# Altium PCB MezzanineDCDC_R1.PcbDoc (part 1 of 3)
Units mm, origin at the board's own origin, x right, y up, seen from the top; angles counter-clockwise.
Board outline 70 x 70 mm, 4 copper layers (Top Layer, GND 1, Signal, Bottom Layer), stack 1.554 mm thick; 95 components, 53 nets, 436 pads, 382 vias.
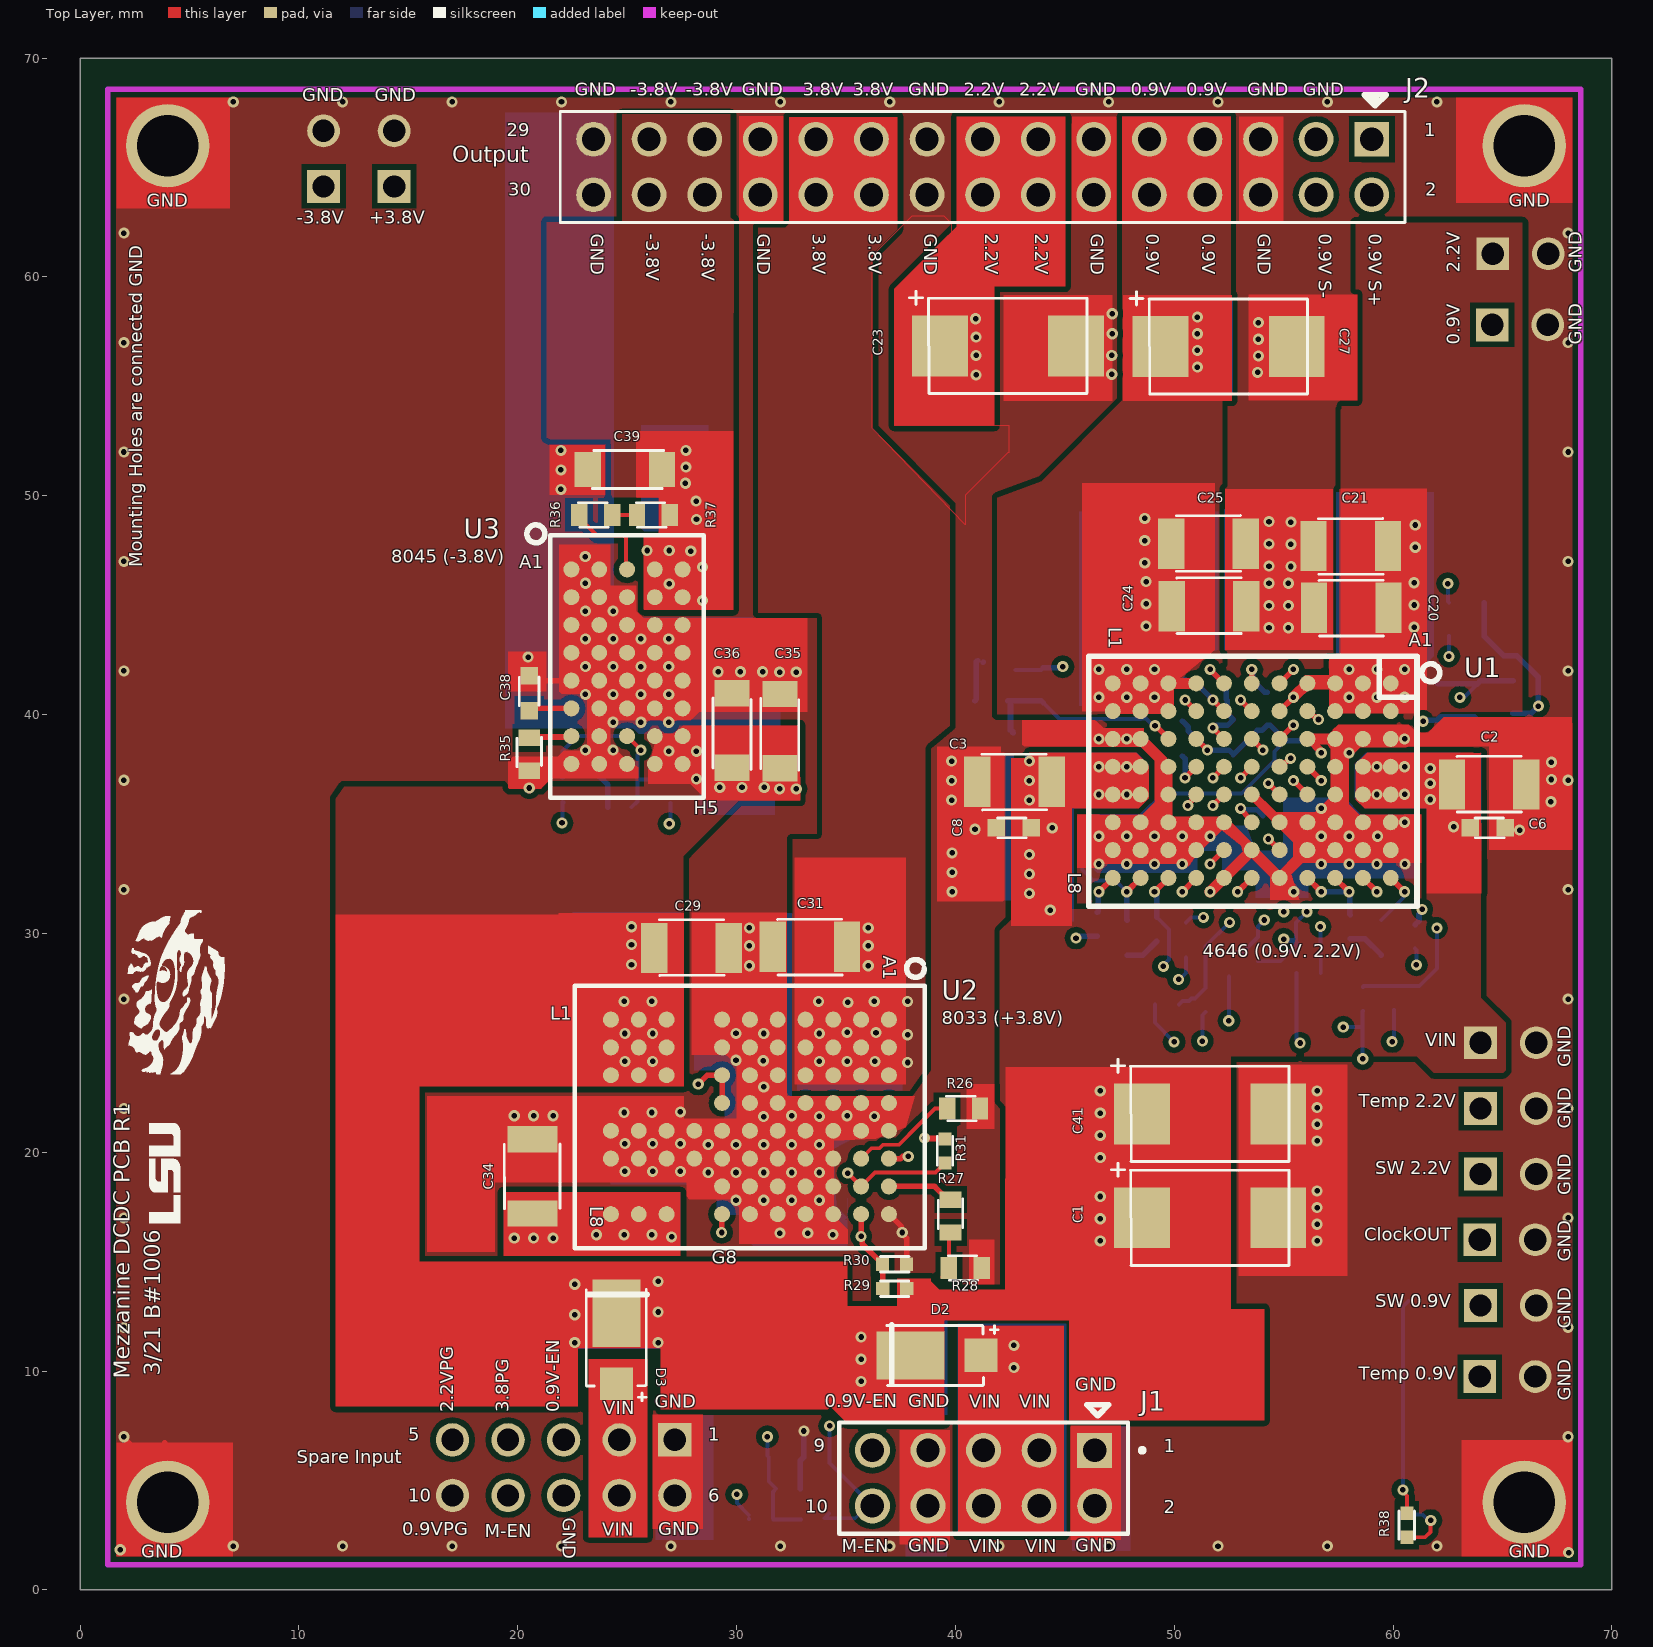
[diagram p0: Top Layer view]
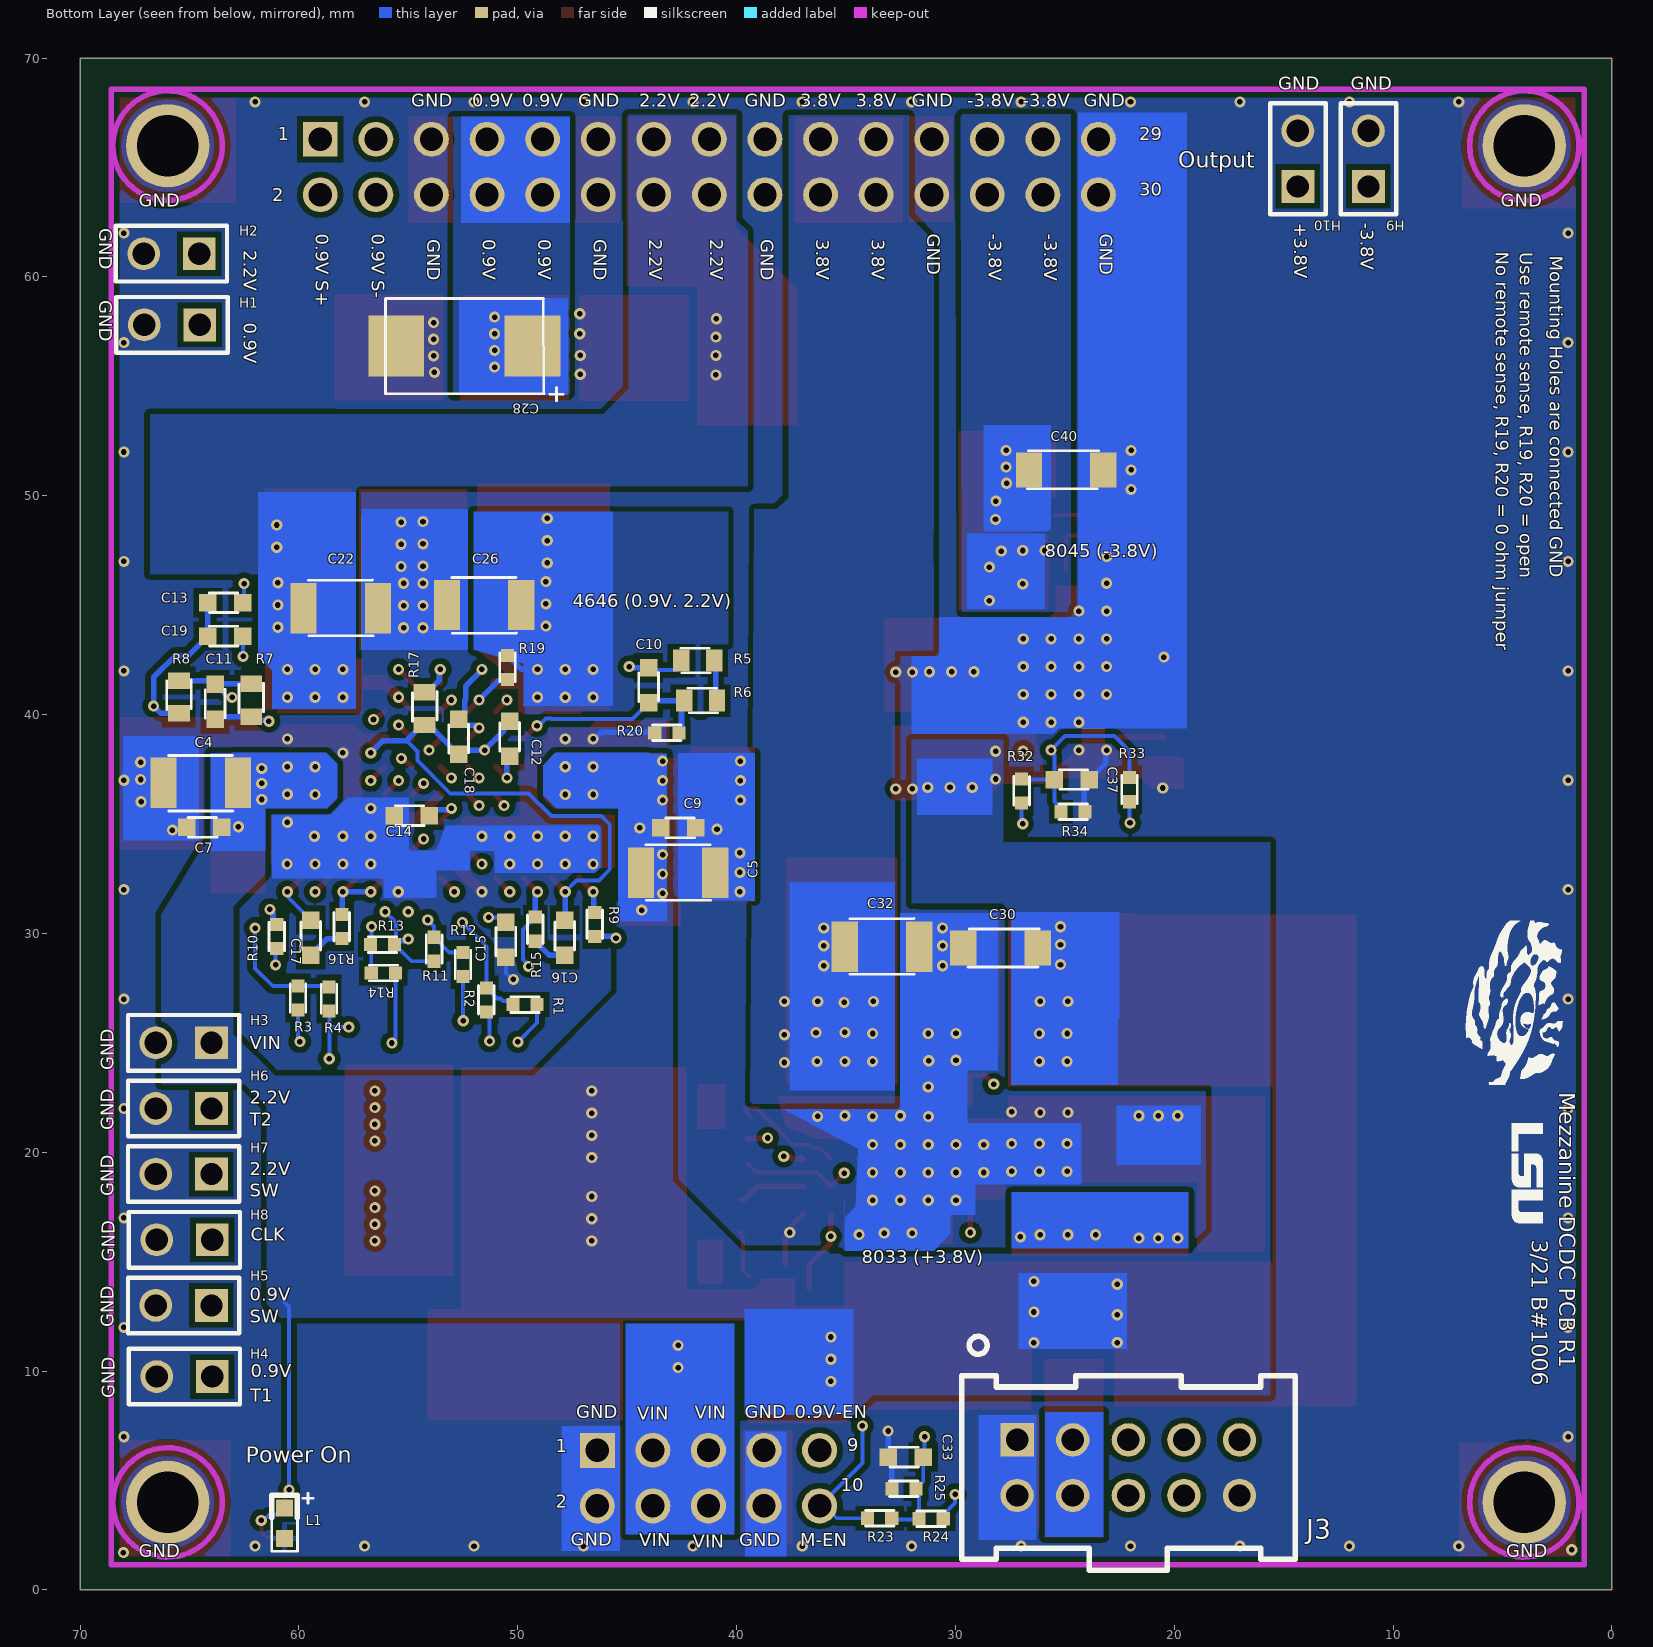
[diagram p1: Bottom Layer view, seen from below]
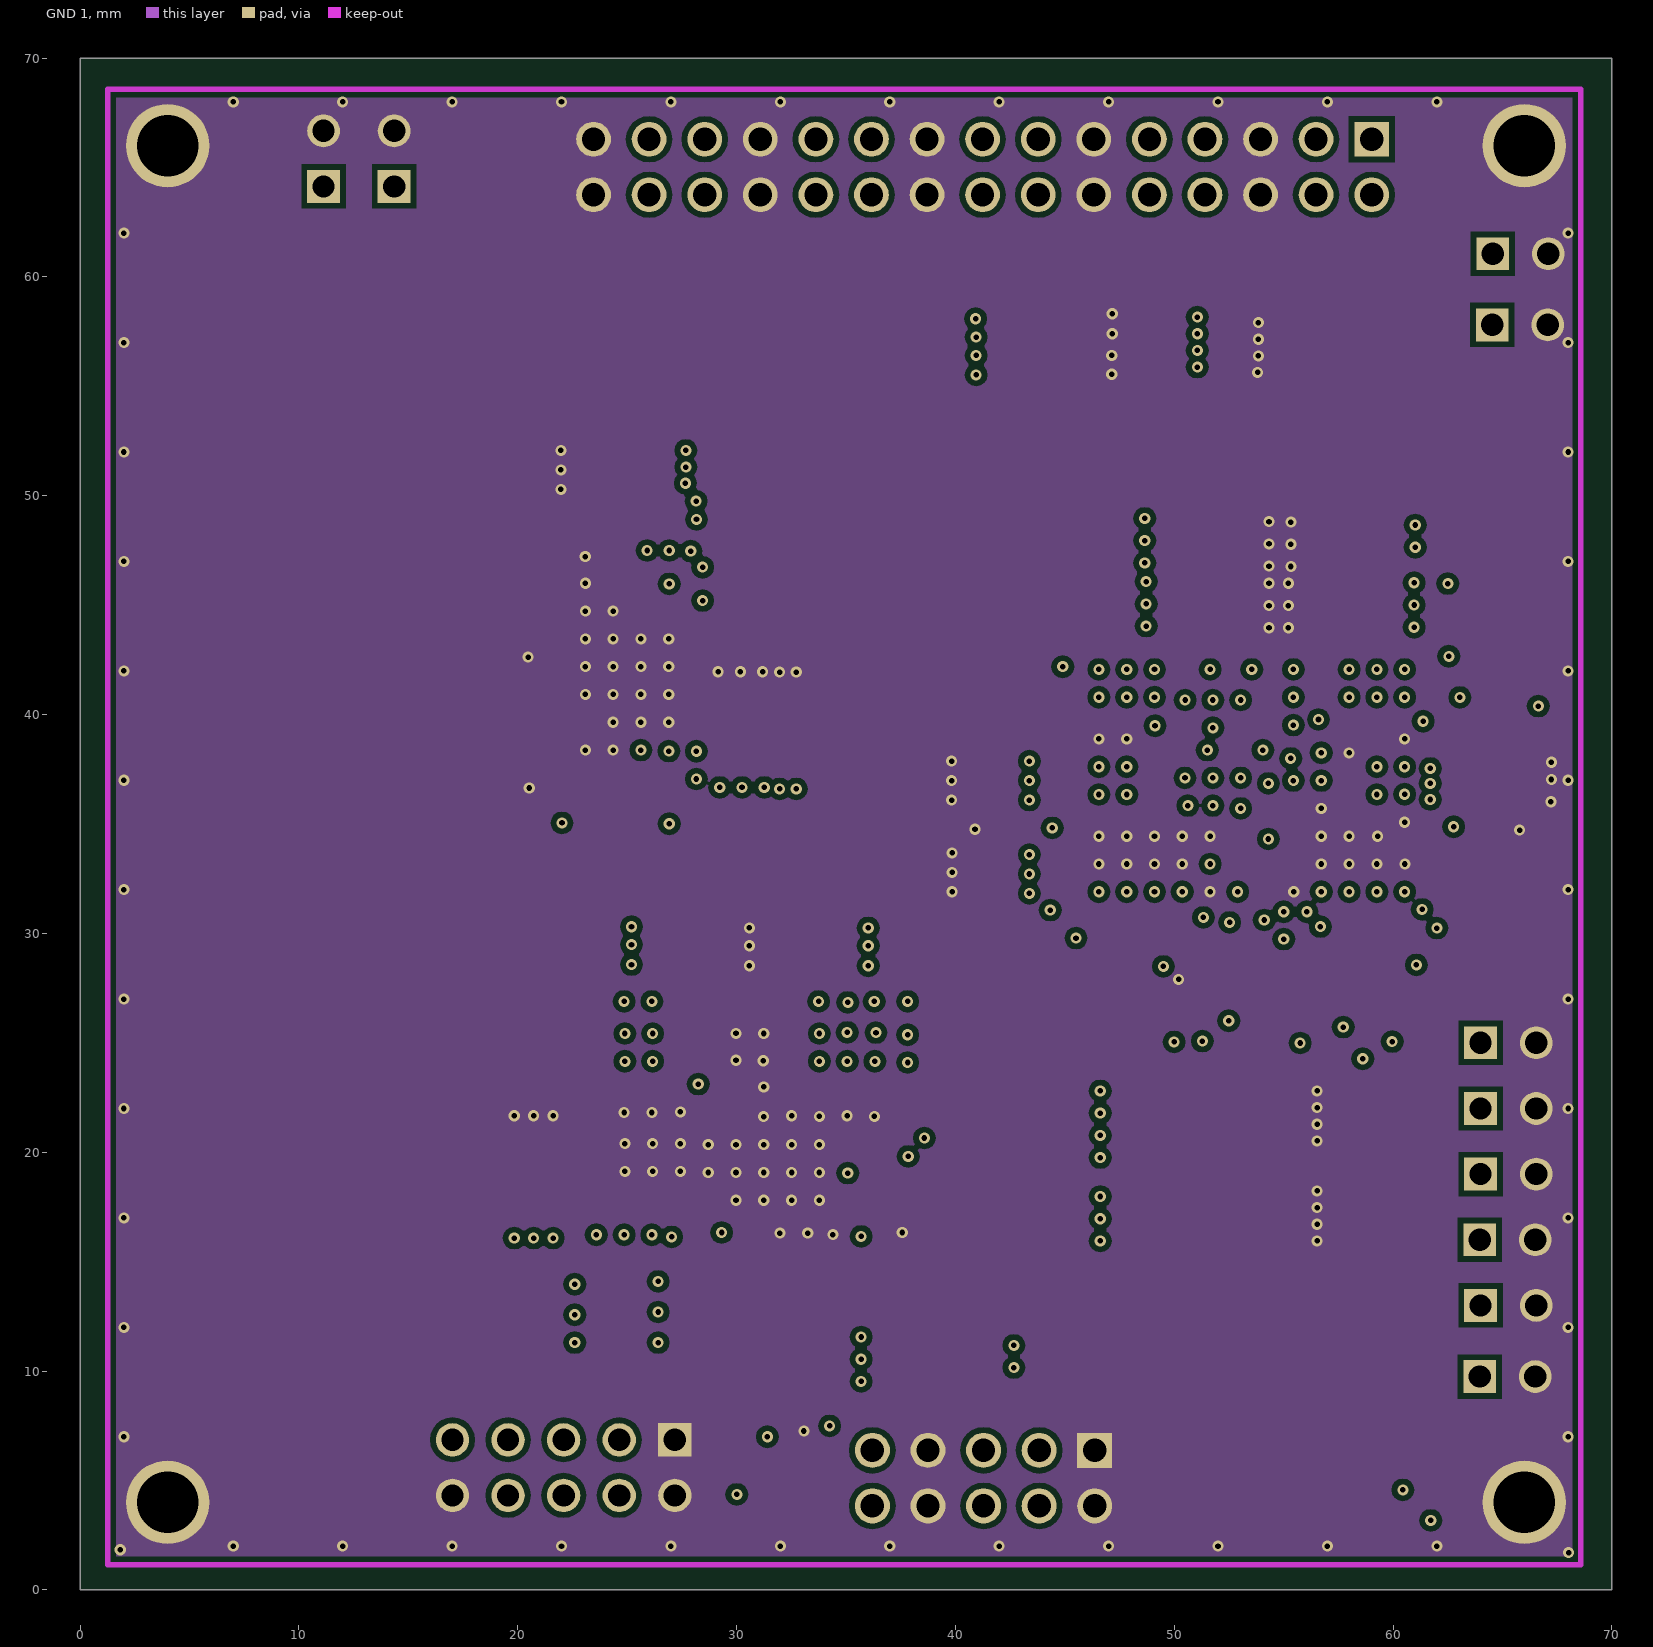
[diagram p2: GND 1]
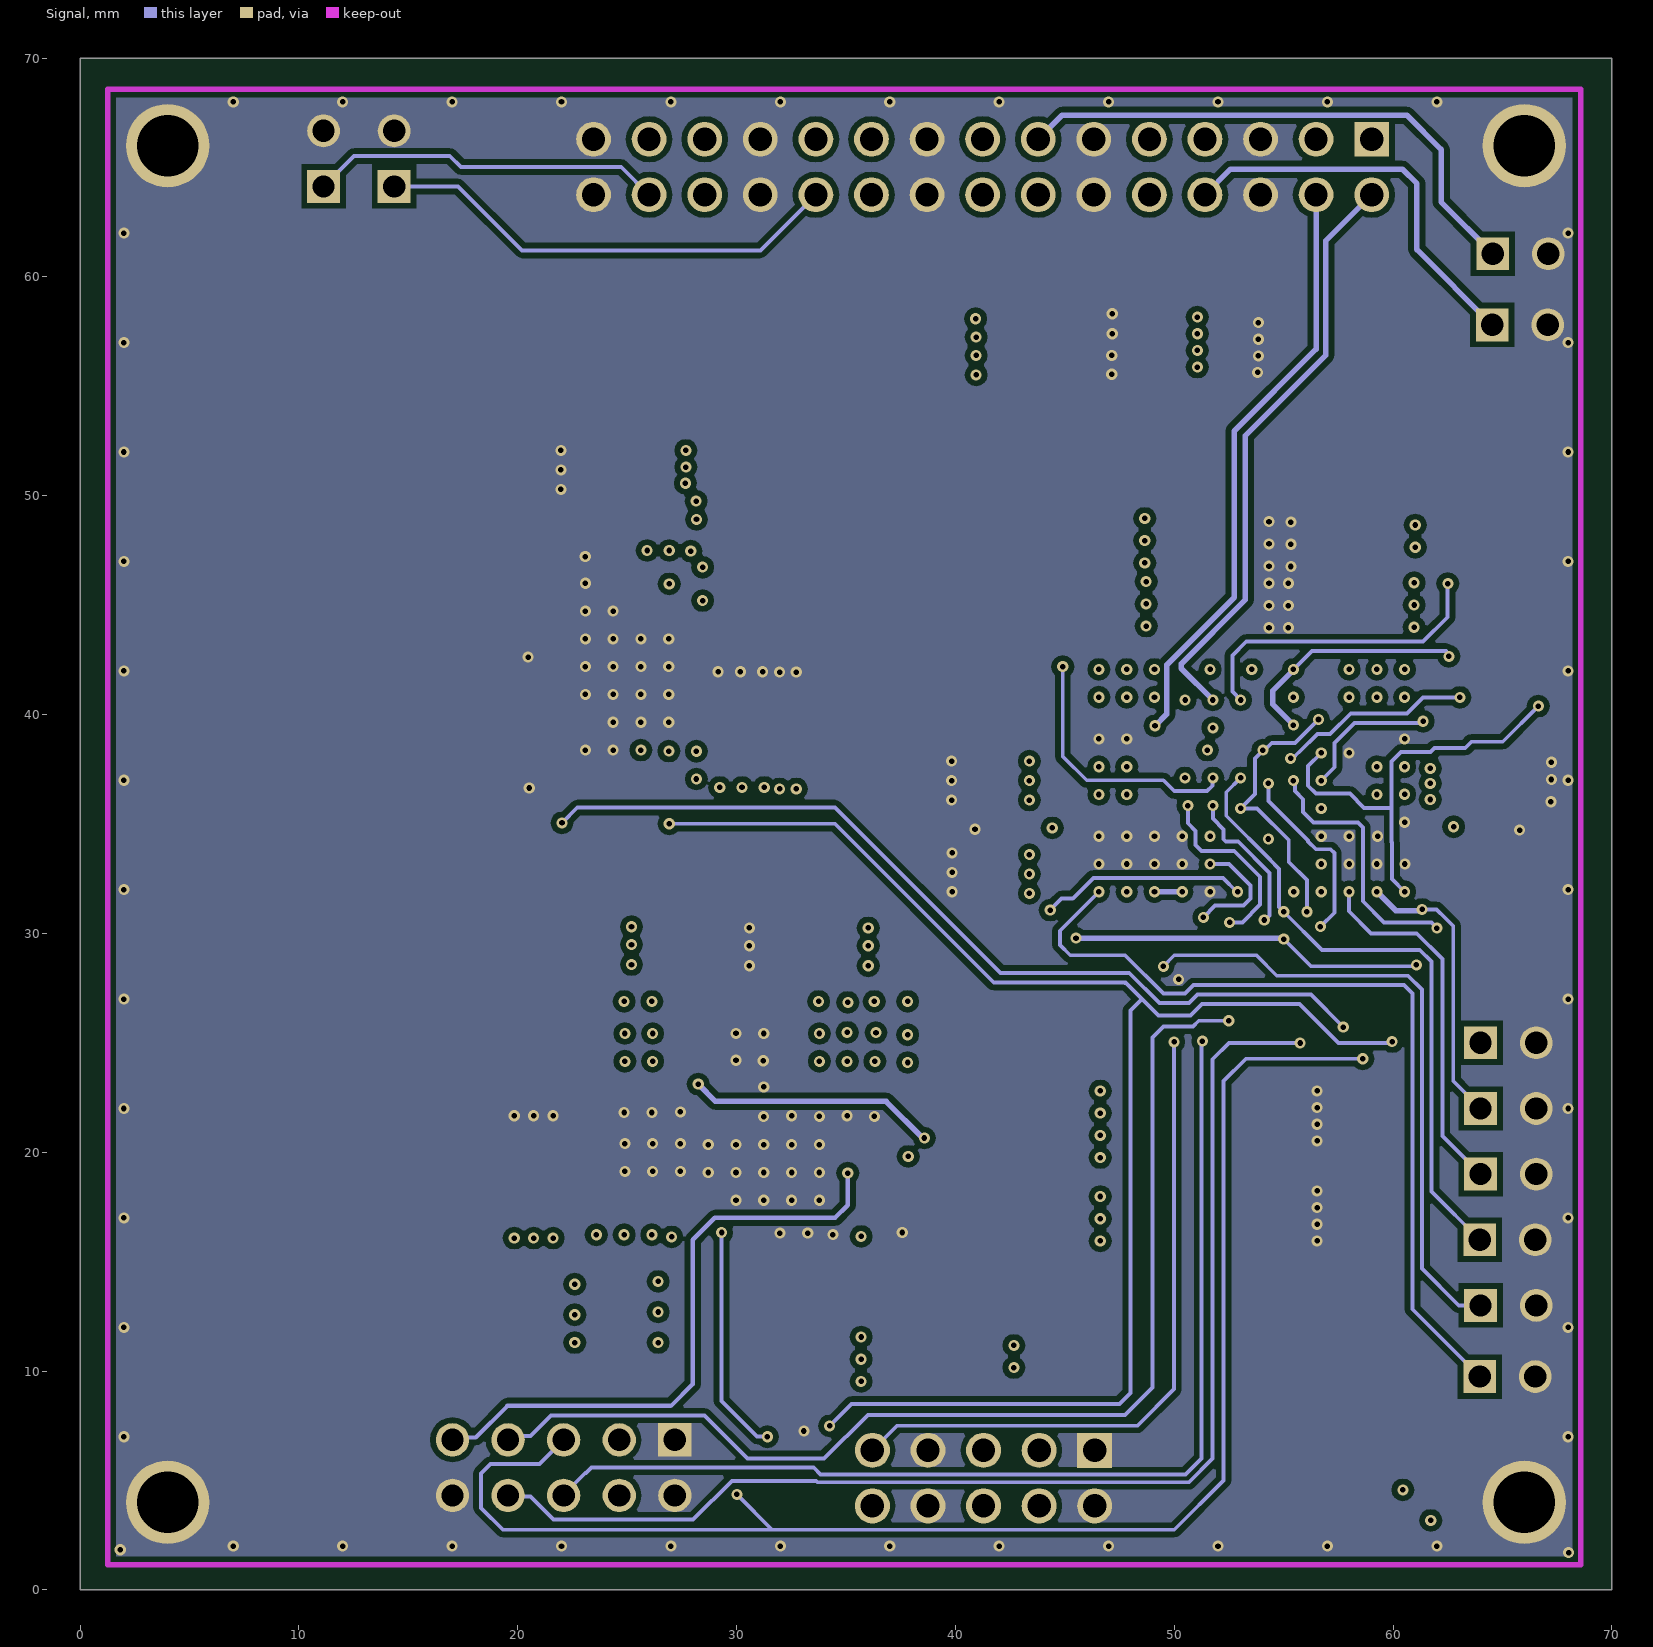
[diagram p3: Signal]

## Layer stack, top to bottom
Top Solder: solder mask 0.0102, Solder Resist, Dk 3.5
Top Layer: signal copper 0.0711
Dielectric 4: prepreg 0.1626, PP-006, Dk 4.1
GND 1: signal copper 0.0356
Dielectric 1: dielectric 1.016, FR-4, Dk 4.8
Signal: signal copper 0.0356
Dielectric 5: prepreg 0.1626, PP-006, Dk 4.1
Bottom Layer: signal copper 0.0711
Bottom Solder: solder mask 0.0102, Solder Resist, Dk 3.5

## Board outline
0,0 0,70 70,70 70,0

## Design rules (kind name [scope] priority, off if disabled: settings)
Clearance Clearance_1 [All] p1: gap=0.178 ignorepadtopadclearanceinfootprint=FALSE except(0.254: Arc-Fill Arc-Poly Arc-Region Track-Fill Track-Poly Track-Region SMDPad-Fill SMDPad-Poly SMDPad-Region THPad-Fill THPad-Poly THPad-Region Via-Fill Via-Poly Via-Region Fill-Fill Fill-Poly Fill-Region Fill-Hole Poly-Poly Poly-Region Poly-Hole Region-Region Region-Hole)
DiffPairsRouting [All] p1: maxlimit=0.254 minlimit=0.254 mostfreqgap=0.254 substack1={2EBA0CF7-B037-426B-A4ED-88C65EFE7A22} toplayer_{2eba0cf7-b037-426b-a4ed-88c65efe7a22}_minwidth=0.381 toplayer_{2eba0cf7-b037-426b-a4ed-88c65efe7a22}_maxwidth=0.381 toplayer_{2eba0cf7-b037-426b-a4ed-88c65efe7a22}_prefwidth=0.381 midlayer1_{2eba0cf7-b037-426b-a4ed-88c65efe7a22}_minwidth=0.381 midlayer1_{2eba0cf7-b037-426b-a4ed-88c65efe7a22}_maxwidth=0.381 midlayer1_{2eba0cf7-b037-426b-a4ed-88c65efe7a22}_prefwidth=0.381 midlayer4_{2eba0cf7-b037-426b-a4ed-88c65efe7a22}_minwidth=0.381 midlayer4_{2eba0cf7-b037-426b-a4ed-88c65efe7a22}_maxwidth=0.381 midlayer4_{2eba0cf7-b037-426b-a4ed-88c65efe7a22}_prefwidth=0.381 bottomlayer_{2eba0cf7-b037-426b-a4ed-88c65efe7a22}_minwidth=0.381 bottomlayer_{2eba0cf7-b037-426b-a4ed-88c65efe7a22}_maxwidth=0.381 bottomlayer_{2eba0cf7-b037-426b-a4ed-88c65efe7a22}_prefwidth=0.381 toplayer_minwidth=0.381 toplayer_maxwidth=0.381 toplayer_prefwidth=0.381 midlayer1_minwidth=0.381 midlayer1_maxwidth=0.381 midlayer1_prefwidth=0.381 midlayer4_minwidth=0.381 midlayer4_maxwidth=0.381 midlayer4_prefwidth=0.381 bottomlayer_minwidth=0.381 bottomlayer_maxwidth=0.381 bottomlayer_prefwidth=0.381 substack2={2E0713D7-164F-4516-AF41-5BA8AA759C5D} toplayer_{2e0713d7-164f-4516-af41-5ba8aa759c5d}_minwidth=0.381 toplayer_{2e0713d7-164f-4516-af41-5ba8aa759c5d}_maxwidth=0.381 toplayer_{2e0713d7-164f-4516-af41-5ba8aa759c5d}_prefwidth=0.381 midlayer1_{2e0713d7-164f-4516-af41-5ba8aa759c5d}_minwidth=0.381 midlayer1_{2e0713d7-164f-4516-af41-5ba8aa759c5d}_maxwidth=0.381 midlayer1_{2e0713d7-164f-4516-af41-5ba8aa759c5d}_prefwidth=0.381 midlayer4_{2e0713d7-164f-4516-af41-5ba8aa759c5d}_minwidth=0.381 midlayer4_{2e0713d7-164f-4516-af41-5ba8aa759c5d}_maxwidth=0.381 midlayer4_{2e0713d7-164f-4516-af41-5ba8aa759c5d}_prefwidth=0.381 bottomlayer_{2e0713d7-164f-4516-af41-5ba8aa759c5d}_minwidth=0.381 bottomlayer_{2e0713d7-164f-4516-af41-5ba8aa759c5d}_maxwidth=0.381 bottomlayer_{2e0713d7-164f-4516-af41-5ba8aa759c5d}_prefwidth=0.381 maxuncoupledlength=12.7
HoleSize [All] p1: absolutevalues=TRUE maxlimit=3.048 minlimit=0.127 maxpercent=80.000 minpercent=20.000
MinimumAnnularRing [IsVia] p1: minimumring=0.127
MinimumAnnularRing MinimumAnnularRing_1 [All] p2: minimumring=0.178
MinimumSolderMaskSliver [All] p1 off: minsoldermaskwidth=0.254
PolygonConnect [All] p1: connectstyle=Relief reliefconductorwidth=0.254 reliefentries=4 polygonreliefangle="90 Angle" airgapwidth=0.254
RoutingVias [All] p1: holewidth=0.711 width=1.27 viastyle="Through Hole" minholewidth=0.711 minwidth=1.27 maxholewidth=0.711 maxwidth=1.27
SilkToSilkClearance [All] p1 off: silktosilkclearance=0.254
SilkToSolderMaskClearance [IsPad] p1 off: minsilkscreentomaskgap=0.254 clearancetoexposedcopper=TRUE
SolderMaskExpansion [All] p1: expansion=0.127 istentingtop=FALSE
Width [All] p1: maxlimit=2.54 minlimit=0.178 preferedwidth=0.254 substack1={2EBA0CF7-B037-426B-A4ED-88C65EFE7A22} substack2={2E0713D7-164F-4516-AF41-5BA8AA759C5D}
25 further rules are at their usual default settings.

## Classes and differential pairs
component class U_MezzanineDCDC_4646: C1 C2 C3 C4 C5 C6 C7 C8 C9 C10 C11 C12 C13 C14 C15 C16 C17 C18 C19 C20 C21 C22 C23 C24 C25 C26 C27 C28 C41 H1 H2 H3 H4 H5 H6 H7 H8 R1 R2 R3 R4 R5 R6 R7 R8 R9 R10 R11 R12 R13 R14 R15 R16 R17 R19 R20 U1
component class U_MezzanineDCDC_8045: C35 C36 C37 C38 C39 C40 H9 R32 R33 R34 R35 R36 R37 U3
component class MezzanineDCDC_Overall: D2 D3 J1 J2 J3 L1 R38
component class U_MezzanineDCDC_8033: C29 C30 C31 C32 C33 C34 H10 R23 R24 R25 R26 R27 R28 R29 R30 R31 U2

## Components (designator, comment, footprint, x,y, rotation, side; value= is the part's Value field where it differs from the comment)
C1 "TAJE107K020RNJ" "CAP 2917 TANTALUM POLARIZED TAJE107K020RNJ" 48.53,17 r0 top locked value="100uF 20V"
C2 "GRM32ER61E226KE15L" "CAP 1210 MURATA" 62.691,36.805 r0 top locked value="22uF 25V"
C3 "GRM32ER61E226KE15L" "CAP 1210 MURATA" 44.398,36.934 r180 top locked value="22uF 25V"
C4 "GRM32ER61E226KE15L" "CAP 1210 MURATA" 62.789,36.881 r0 bottom locked value="22uF 25V"
C5 "GRM32ER61E226KE15L" "CAP 1210 MURATA" 44.37,32.766 r180 bottom locked value="22uF 25V"
C6 "GCM188R71E105KA64D" "CAP 0603 TDK" 63.525,34.823 r0 top locked value="1uF 25V"
C7 "GCM188R71E105KA64D" "CAP 0603 TDK" 63.526,34.849 r0 bottom locked value="1uF 25V"
C8 "C1608X7R1E224K080AC" "CAP 0603 TDK" 43.459,34.823 r180 top locked value="0.22uF 25V"
C9 "C1608X7R1E224K080AC" "CAP 0603 TDK" 43.459,34.823 r180 bottom locked value="0.22uF 25V"
C10 "opt" "CAP 0603 TDK" 44.018,42.138 r270 bottom locked
C11 "opt" "CAP 0603 TDK" 63.83,41.376 r270 bottom locked
C12 "0603YC273KAT2A" "CAP 0603 TDK" 50.368,38.1 r90 bottom locked value=27nF
C13 "0603YC273KAT2A" "CAP 0603 TDK" 62.56,45.11 r0 bottom locked value=27nF
C14 "C1608X5R1C475K080AC" "CAP 0603 TDK" 54.051,35.382 r0 bottom locked value=opt
C15 "C1608X5R1C475K080AC" "CAP 0603 TDK" 50.546,30.505 r270 bottom locked value=4.7uF
C16 "opt" "CAP 0603 TDK" 47.854,29.007 r90 bottom locked
C17 "opt" "CAP 0603 TDK" 59.461,29.007 r90 bottom locked
C18 "0603YC101KAT2A" "CAP 0603 TDK" 52.705,39.776 r270 bottom locked value=100pF
C19 "0603YC101KAT2A" "CAP 0603 TDK" 62.56,43.586 r0 bottom locked value=100pF
C20 "GRM32ER60J107ME20K" "CAP 1210 Murata" 59.792,44.882 r180 top locked value=100uF
C21 "GRM32ER60J107ME20K" "CAP 1210 Murata" 59.766,47.701 r180 top locked value=100uF
C22 "GRM32ER60J107ME20K" "CAP 1210 Murata" 59.792,44.856 r180 bottom locked value=100uF
C23 "4TPE470MCL" "CAP 2917 Tantalum Polarized" 39.294,56.845 r0 top value=470uF
C24 "GRM32ER60J107ME20K" "CAP 1210 Murata" 49.889,44.958 r0 top locked value=100uF
C25 "GRM32ER60J107ME20K" "CAP 1210 Murata" 49.864,47.803 r0 top locked value=100uF
C26 "GRM32ER60J107ME20K" "CAP 1210 Murata" 49.838,45.009 r0 bottom locked value=100uF
C27 "4TPE470MCL" "CAP 2917 Tantalum Polarized" 49.378,56.82 r0 top locked value=470uF
C28 "4TPE470MCL" "CAP 2917 Tantalum Polarized" 49.33,56.843 r0 bottom locked value=470uF
C29 "GRM32ER61E226KE15L" "CAP 1210 MURATA" 26.242,29.337 r0 top locked value="22uF 25V"
C30 "UMK316BJ475KL-T" "CAP 1206 TDK" 26.242,29.337 r0 bottom locked value="4.7uF 50V"
C31 "LMK325BJ107MM-T" "CAP 1210 MURATA" 35.05,29.388 r180 top locked value="100uF 10V"
C32 "OPT" "CAP 1210 MURATA" 35.054,29.388 r180 bottom locked value=opt
C33 "C1608X7R1E224K080AC" "CAP 0603 TDK" 31.471,6.071 r0 bottom locked value="0.22uF 25V"
C34 "GRM32ER71H106KA12L" "CAP 1210 MURATA" 20.677,17.196 r90 top locked value=10uF
C35 "C3216X5R1E476M160AC" "CAP 1206 TDK" 31.979,37.545 r90 top locked value="47uF 25V"
C36 "UMK316BJ475KL-T" "CAP 1206 TDK" 29.794,37.57 r90 top locked value="4.7uF 50V"
C37 "C1608X7R1E104K080AA" "CAP 0603 TDK" 25.476,37.033 r180 bottom locked value="0.1uF 25V"
C38 "C1608X7R1E104K080AA" "CAP 0603 TDK" 20.523,40.183 r90 top locked value=0.1uF
C39 "12066D476MAT4A" "CAP 1206 TDK 2.3 Height" 26.594,51.206 r180 top locked value="47uF 6.3V"
C40 "opt" "CAP 1206 TDK 2.3 Height" 26.641,51.181 r180 bottom locked
C41 "TAJE107K020RNJ" "CAP 2917 TANTALUM POLARIZED TAJE107K020RNJ" 48.53,21.75 r0 top locked value="100uF 20V"
D2 "V8PAL50-M3/I" "SCHOTTKY DIODE V8PAL50-M3/I" 37.953,10.719 r0 top locked
D3 "V8PAL50-M3/I" "SCHOTTKY DIODE V8PAL50-M3/I" 24.511,12.643 r270 top locked
H1 "Header" "HEADER 2PIN" 64.53,57.81 r180 bottom locked
H2 "Header" "HEADER 2PIN" 64.555,61.062 r180 bottom locked
H3 "Header" "HEADER 2PIN" 64,25 r180 bottom locked
H4 "Header" "HEADER 2PIN" 63.96,9.75 r180 bottom locked
H5 "Header" "HEADER 2PIN" 64,13 r180 bottom locked
H6 "Header" "HEADER 2PIN" 64,22 r180 bottom locked
H7 "Header" "HEADER 2PIN" 64,19 r180 bottom locked
H8 "Header" "HEADER 2PIN" 63.96,16 r180 bottom locked
H9 "Header" "HEADER 2PIN" 11.125,64.135 r270 bottom locked
H10 "Header" "HEADER 2PIN" 14.351,64.135 r270 bottom locked
J1 "Samtec IPT1-105-01-L-D" SAMTEC_IPT1-105-01-L-D 46.367,6.379 r180 top locked
J2 "Samtec IPT1-115-01-L-D" IPT1-115-01-L-D 59.023,66.292 r180 top locked
J3 "Samtec IPL1-105-01-L-D" IPL1-105-01-L-D 27.178,6.858 r180 bottom locked
L1 "LTST-C191KRKT" LED 60.655,3.734 r180 bottom locked
R1 "CRCW04020000ZSTD" "RESISTOR ERJ2G/CRCW 0402" 50.216,26.746 r180 bottom locked value="0 ohm jumper"
R2 "opt" "RESISTOR ERJ2G/CRCW 0402" 51.435,27.508 r270 bottom locked
R3 "CRCW04020000ZSTD" "RESISTOR ERJ2G/CRCW 0402" 60.046,27.592 r270 bottom locked value="0 ohm jumper"
R4 "opt" "RESISTOR ERJ2G/CRCW 0402" 58.623,27.559 r270 bottom locked
R5 "ERA-3AEB124V" "RESISTOR 0603 - ERJ" 41.021,42.469 r0 bottom locked value="120k 0.1%"
R6 "ERA-3AEB8250V" "RESISTOR 0603 - ERJ" 42.394,40.64 r180 bottom locked value="825 0.1%"
R7 "ERA-3AEB2262V" "RESISTOR 0603 - ERJ" 62.179,39.903 r90 bottom locked value="22.6k 0.1%"
R8 "ERA-3AEB1652V" "RESISTOR 0603 - ERJ" 65.481,40.054 r90 bottom locked value="16.5k 0.1%"
R9 "ERA-2AEB4992X" "RESISTOR ERJ2G/CRCW 0402" 46.482,30.963 r270 bottom locked value=50k
R10 "ERA-2AEB4992X" "RESISTOR ERJ2G/CRCW 0402" 61.011,30.404 r270 bottom locked value=50k
R11 "ERJ-2GEJ103X" "RESISTOR ERJ2G/CRCW 0402" 53.823,29.827 r270 bottom locked value=10k
R12 "ERJ-2GEJ102X" "RESISTOR ERJ2G/CRCW 0402" 52.502,28.034 r90 bottom locked value=1k
R13 "ERJ-2GEJ103X" "RESISTOR ERJ2G/CRCW 0402" 56.726,29.489 r180 bottom locked value=10k
R14 "ERJ-2GEJ102X" "RESISTOR ERJ2G/CRCW 0402" 55.593,28.194 r0 bottom locked value=1k
R15 "opt" "RESISTOR ERJ2G/CRCW 0402" 49.2,29.642 r90 bottom locked
R16 "opt" "RESISTOR ERJ2G/CRCW 0402" 58.039,29.761 r90 bottom locked
R17 "ERA-3AEB333V" "RESISTOR 0603 - ERJ" 54.254,39.522 r90 bottom locked value="33k 0.1%"
R19 "opt" "RESISTOR ERJ2G/CRCW 0402" 50.47,42.705 r270 bottom locked
R20 "opt" "RESISTOR ERJ2G/CRCW 0402" 43.739,39.167 r180 bottom locked
R23 "ERJ-U02F1502X" "RESISTOR ERJ2G/CRCW 0402" 32.911,3.277 r0 bottom locked value=15k
R24 "opt" "RESISTOR ERJ2G/CRCW 0402" 31.656,3.251 r180 bottom locked
R25 "opt" "RESISTOR ERJ2G/CRCW 0402" 32.901,4.623 r180 bottom locked
R26 "ERJ-PB3B1782V" "RESISTOR 0603 - ERJ" 41.124,21.996 r180 top locked value="17.8k 0.1%"
R27 "ERA-3AEB134V" "RESISTOR 0603 - ERJ" 39.778,16.332 r90 top locked value="130k 0.1%"
R28 "ERA-3AEB8250V" "RESISTOR 0603 - ERJ" 41.2,14.707 r180 top locked value="825 0.1%"
R29 "opt" "RESISTOR ERJ2G/CRCW 0402" 36.678,13.767 r0 top locked
R30 "ERJ-2GEJ103X" "RESISTOR ERJ2G/CRCW 0402" 37.77,14.884 r180 top locked value=10k
R31 "ERJ-2RKF1003X" "RESISTOR ERJ2G/CRCW 0402" 39.522,20.607 r270 top locked value=100k
R32 "CRCW04024K99FKED" "RESISTOR ERJ2G/CRCW 0402" 26.975,37.059 r270 bottom locked value=4.99k
R33 "opt" "RESISTOR ERJ2G/CRCW 0402" 22.047,37.117 r270 bottom locked
R34 "opt" "RESISTOR ERJ2G/CRCW 0402" 24.071,35.56 r0 bottom locked
R35 "ERJ-PB3B6492V" "RESISTOR 0603 - ERJ" 20.523,37.44 r90 top locked value="64.9k 0.1%"
R36 "ERA-3AEB4532V" "RESISTOR 0603 - ERJ" 24.309,49.124 r180 top locked value="45.3k 0.1%"
R37 "ERA-3AEB301V" "RESISTOR 0603 - ERJ" 26.951,49.124 r180 top locked value="300 0.1%"
R38 "ERJ-2GEJ102X" "RESISTOR ERJ2G/CRCW 0402" 60.63,3.505 r270 top locked value=1k
U1 "LTM4646IY_REV_0" LTM4646 53.543,36.982 r270 top locked net-tie
U2 "LTM8033EY#PBF" "LTM8033 BGA" 30.609,21.615 r270 top locked
U3 "LTM8045EY#PBF" LTM8045 24.994,42.189 r0 top locked

## Footprints (in the part's own frame and the unit in brackets; to place one, negate y for a bottom-side part, rotate by r counter-clockwise, add the part's x,y. Pads: shape width x height; smd on the part's side, far side on the other; paste and mask are expansions set on the pad)
"CAP 0603 TDK" [mm]
  rect 0.8x0.8 smd: 1(0,0) 2(1.6,0)
  silkscreen extent 0.22,-0.45 1.54,0.45, body extent 0,-0.4 1.6,0.4, height 0.9
"CAP 1206 TDK" [mm]
  rect 1.2x1.6 smd: 1(0,0) 2(3.4,0)
  silkscreen extent -0.08,-0.86 3.19,0.87, body extent 0,-0.8 3.2,0.8, height 1.9
"CAP 1206 TDK 2.3 Height" [mm]
  rect 1.2x1.6 smd: 1(0,0) 2(3.4,0)
  silkscreen extent -0.08,-0.86 3.19,0.87, body extent 0,-0.84 3.2,0.84, height 2.3
"CAP 1210 MURATA" [mm]
  rect 1.2x2.3 smd: 1(0,0) 2(3.4,0)
  silkscreen extent 0.23,-1.26 3.18,1.29, body extent 0.01,-1.25 3.2,1.25, height 2.7
"CAP 1210 Murata" [mm]
  rect 1.2x2.3 smd: 1(0,0) 2(3.4,0)
  silkscreen extent 0.23,-1.26 3.18,1.29, body extent 0.01,-1.25 3.2,1.25, height 2.7
"CAP 2917 Tantalum Polarized" [mm]
  rect 2.55x2.77 smd: 1(0,0) 2(6.22,0)
  silkscreen extent -1.4,-2.18 6.72,2.5, body extent -0.54,-2.14 6.74,2.18, height 3
"CAP 2917 TANTALUM POLARIZED TAJE107K020RNJ" [mm]
  rect 2.55x2.77 smd: 1(0,0) 2(6.22,0)
  silkscreen extent -1.4,-2.18 6.72,2.5, body extent -0.54,-2.14 6.74,2.18, height 4.3
"HEADER 2PIN" [mm]
  rect 1.5x1.5 hole 1.016: 1(0,0)
  round 1.5 hole 1.016: 2(-2.54,0)
  silkscreen extent -3.81,-1.27 1.27,1.27, body extent -3.73,-1.17 1.27,1.18, height 8.38
IPL1-105-01-L-D [mil] "Discrete wire header"
  rect 60x60 hole 40 mask+3: 1(0,0)
  round 60 hole 40 mask+3: 2(100,0) 3(200,0) 4(300,0) 6(0,-100) 7(100,-100) 8(200,-100) 9(300,-100) 10(400,-100)
  round 60 hole 40: 5(400,0)
  silkscreen extent -100,-235 500,115, body extent -95,-215 482,115, height 320
IPT1-115-01-L-D [mm]
  rect 1.59x1.59 hole 1.06: 1(0,0)
  round 1.59 hole 1.06: 2(0,2.54) 3(2.54,0) 4(2.54,2.54) 5(5.08,0) 6(5.08,2.54) 7(7.62,0) 8(7.62,2.54) 9(10.16,0) 10(10.16,2.54) 11(12.7,0) 12(12.7,2.54) 13(15.24,0) 14(15.24,2.54) 15(17.78,0) 16(17.78,2.54) 17(20.32,0) 18(20.32,2.54) 19(22.86,0) 20(22.86,2.54) 21(25.4,0) 22(25.4,2.54) 23(27.94,0) 24(27.94,2.54) 25(30.48,0) 26(30.48,2.54) 27(33.02,0) 28(33.02,2.54) 29(35.56,0) 30(35.56,2.54)
  silkscreen extent -1.52,-1.9 37.08,3.81, body extent -1.47,-1.28 37.11,3.78, height 6.35
LED [mil]
  rect 30x30 smd: 1(0,0.5) 2(0,-54.5)
  silkscreen extent -23,-78 51,27, body extent -16,-62 16,0, height 26
LTM4646 [mm]
  round 0.73 smd: A1(-4.445,6.35) A2(-3.175,6.35) A3(-1.905,6.35) A4(-0.635,6.35) A5(0.635,6.35) A6(1.905,6.35) A7(3.175,6.35) A8(4.445,6.35) B1(-4.445,5.08) B2(-3.175,5.08) B3(-1.905,5.08) B4(-0.635,5.08) B5(0.635,5.08) B6(1.905,5.08) B7(3.175,5.08) B8(4.445,5.08) C1(-4.445,3.81) C2(-3.175,3.81) C3(-1.905,3.81) C4(-0.635,3.81) C5(0.635,3.81) C6(1.905,3.81) C7(3.175,3.81) C8(4.445,3.81) D1(-4.445,2.54) D2(-3.175,2.54) D3(-1.905,2.54) D4(-0.635,2.54) D5(0.635,2.54) D6(1.905,2.54) D7(3.175,2.54) D8(4.445,2.54) E1(-4.445,1.27) E2(-3.175,1.27) E3(-1.905,1.27) E4(-0.635,1.27) E5(0.635,1.27) E6(1.905,1.27) E7(3.175,1.27) E8(4.445,1.27) F1(-4.445,0) F2(-3.175,0) F3(-1.905,0) F4(-0.635,0) F5(0.635,0) F6(1.905,0) F7(3.175,0) F8(4.445,0) G1(-4.445,-1.27) G2(-3.175,-1.27) G3(-1.905,-1.27) G4(-0.635,-1.27) G5(0.635,-1.27) G6(1.905,-1.27) G7(3.175,-1.27) G8(4.445,-1.27) H1(-4.445,-2.54) H2(-3.175,-2.54) H3(-1.905,-2.54) H4(-0.635,-2.54) H5(0.635,-2.54) H6(1.905,-2.54) H7(3.175,-2.54) H8(4.445,-2.54) J1(-4.445,-3.81) J2(-3.175,-3.81) J3(-1.905,-3.81) J4(-0.635,-3.81) J5(0.635,-3.81) J6(1.905,-3.81) J7(3.175,-3.81) J8(4.445,-3.81) K1(-4.445,-5.08) K2(-3.175,-5.08) K3(-1.905,-5.08) K4(-0.635,-5.08) K5(0.635,-5.08) K6(1.905,-5.08) K7(3.175,-5.08) K8(4.445,-5.08) L1(-4.445,-6.35) L2(-3.175,-6.35) L3(-1.905,-6.35) L4(-0.635,-6.35) L5(0.635,-6.35) L6(1.905,-6.35) L7(3.175,-6.35) L8(4.445,-6.35)
  Top Layer lines w0.508: -1.905,2.54 -1.905,3.81
  silkscreen extent -5.69,-7.45 5.74,7.55, body extent -5.59,-7.49 5.59,7.49, height 5.01
"LTM8033 BGA" [mm]
  round 0.73 smd: A1(-4.445,6.35) A2(-3.175,6.35) A3(-1.905,6.35) A4(-0.635,6.35) A5(0.635,6.35) A6(1.905,6.35) A7(3.175,6.35) A8(4.445,6.35) B1(-4.445,5.08) B2(-3.175,5.08) B3(-1.905,5.08) B4(-0.635,5.08) B5(0.635,5.08) B6(1.905,5.08) B7(3.175,5.08) B8(4.445,5.08) C1(-4.445,3.81) C2(-3.175,3.81) C3(-1.905,3.81) C4(-0.635,3.81) C5(0.635,3.81) C6(1.905,3.81) C7(3.175,3.81) C8(4.445,3.81) D1(-4.445,2.54) D2(-3.175,2.54) D3(-1.905,2.54) D4(-0.635,2.54) D5(0.635,2.54) D6(1.905,2.54) D7(3.175,2.54) D8(4.445,2.54) E1(-4.445,1.27) E2(-3.175,1.27) E3(-1.905,1.27) E4(-0.635,1.27) E5(0.635,1.27) E6(1.905,1.27) E7(3.175,1.27) E8(4.445,1.27) F1(-4.445,0) F2(-3.175,0) F3(-1.905,0) F4(-0.635,0) F5(0.635,0) F6(1.905,0) F7(3.175,0) F8(4.445,0) G1(-4.445,-1.27) G2(-3.175,-1.27) G3(-1.905,-1.27) G4(-0.635,-1.27) G5(0.635,-1.27) G6(1.905,-1.27) G7(3.175,-1.27) G8(4.445,-1.27) H5(0.635,-2.54) H6(1.905,-2.54) J1(-4.445,-3.81) J2(-3.175,-3.81) J3(-1.905,-3.81) J5(0.635,-3.81) J6(1.905,-3.81) J8(4.445,-3.81) K1(-4.445,-5.08) K2(-3.175,-5.08) K3(-1.905,-5.08) K5(0.635,-5.08) K6(1.905,-5.08) K8(4.445,-5.08) L1(-4.445,-6.35) L2(-3.175,-6.35) L3(-1.905,-6.35) L5(0.635,-6.35) L6(1.905,-6.35) L8(4.445,-6.35)
  silkscreen extent -6,-8 6,8, body extent -5.59,-7.49 5.59,7.49, height 4.92
LTM8045 [mm] "DCDC Converter"
  round 0.73 smd: A1(-2.54,4.445) A2(-1.27,4.445) A3(0,4.445) A4(1.27,4.445) A5(2.54,4.445) B1(-2.54,3.175) B2(-1.27,3.175) B3(0,3.175) B4(1.27,3.175) B5(2.54,3.175) C1(-2.54,1.905) C2(-1.27,1.905) C3(0,1.905) C4(1.27,1.905) C5(2.54,1.905) D1(-2.54,0.635) D2(-1.27,0.635) D3(0,0.635) D4(1.27,0.635) D5(2.54,0.635) E1(-2.54,-0.635) E2(-1.27,-0.635) E3(0,-0.635) E4(1.27,-0.635) E5(2.54,-0.635) F1(-2.54,-1.905) F2(-1.27,-1.905) F3(0,-1.905) F4(1.27,-1.905) F5(2.54,-1.905) G1(-2.54,-3.175) G2(-1.27,-3.175) G3(0,-3.175) G4(1.27,-3.175) G5(2.54,-3.175) H1(-2.54,-4.445) H2(-1.27,-4.445) H3(0,-4.445) H4(1.27,-4.445) H5(2.54,-4.445)
  silkscreen extent -3.5,-6 3.5,6, body extent -3.35,-5.79 3.38,5.85, height 4.92
"RESISTOR 0603 - ERJ" [mm]
  rect 0.75x1 smd: 1(0,0) 2(1.5,0)
  silkscreen extent 0.18,-0.56 1.53,0.56, body extent 0,-0.4 1.6,0.4, height 0.55
"RESISTOR ERJ2G/CRCW 0402" [mm]
  rect 0.6x0.6 smd: 1(0,0) 2(1.1,0)
  silkscreen extent -0.11,-0.36 1.19,0.36, body extent 0,-0.25 1,0.25, height 0.4
SAMTEC_IPT1-105-01-L-D [mil]
  rect 63x63 hole 42: 01(0,0)
  round 63 hole 42: 02(0,100) 03(100,0) 04(100,100) 05(200,0) 06(200,100) 07(300,0) 08(300,100) 09(400,0) 10(400,100)
  silkscreen extent -89,-50 460,150, body extent -56,-47 459,152, height 250
"SCHOTTKY DIODE V8PAL50-M3/I" [mm]
  rect 3.1x2.2 smd: 1(0,0)
  rect 1.5x1.52 smd: 2(3.22,0)
  silkscreen extent -1.09,-1.38 4,1.39, body extent -0.98,-1.38 3.36,1.35, height 1

## Part data
C1 C41: library part "Capacitor 2917 TAJE107K020RNJ", "100µF Molded Tantalum Capacitors 20V 2917 (7343 Metric) 400mOhm", ComponentLink1Description=Digikey, ComponentLink1URL=https://www.digikey.com/en/products/detail/avx-corporation/TAJE107K020RNJ/563850
C2 C3 C4 C5 C29: library part "Capacitor 1210", "22µF ±10% 25V Ceramic Capacitor X5R 1210 (3225 Metric)", ComponentLink1Description=Digikey, ComponentLink1URL=https://www.digikey.com/en/products/detail/murata-electronics/GRM32ER61E226KE15L/965903?s=N4IgTCBcDaIOICUCyBmMBRBA2AjOsYWA0ujgKwAyIAugL5A
C6 C7: library part "Capacitor 0603 TDK", "1µF ±10% 25V Ceramic Capacitor X7R 0603 (1608 Metric)", ComponentLink1Description=Digikey, ComponentLink1URL=https://www.digikey.com/en/products/detail/murata-electronics/GCM188R71E105KA64D/4903956?s=N4IgTCBcDaIOIGECyBGAHGgSgdhQURQAYBWAaQEEA2AFgBEQBdAXyA
C8 C9 C33: library part "Capacitor 0603 TDK", "CAP CER 0.22UF 25V X7R 0603", ComponentLink1Description=Digikey, ComponentLink1URL=https://www.digikey.com/en/products/detail/tdk-corporation/C1608X7R1E224K080AC/1788457?s=N4IgTCBcDaIMIEYBsAGAHADQOwCUEFEwwAWAaXRQEE4QBdAXyA
C10 C11 C16 C17: library part "Capacitor 0603 TDK", "Capacitor 0603"
C12 C13: library part "Capacitor 0603 TDK", "0.027µF ±10% 16V Ceramic Capacitor X7R 0603 (1608 Metric)", ComponentLink1Description=Digikey, ComponentLink1URL=https://www.digikey.com/en/products/detail/avx-corporation/0603YC273KAT2A/1600569
C14 C15: library part "Capacitor 0603 TDK", "CAP CER 4.7UF 16V X5R 0603", ComponentLink1Description=Digikey, ComponentLink1URL=https://www.digikey.com/en/products/detail/tdk-corporation/C1608X5R1C475K080AC/2732913?s=N4IgTCBcDaIMIEYBsAGAHADQKwCUFwBYB2LAaXRQEE4QBdAXyA
C18 C19: library part "Capacitor 0603 TDK", "100pF ±10% 16V Ceramic Capacitor X7R 0603 (1608 Metric)", ComponentLink1Description=Digikey, ComponentLink1URL=https://www.digikey.com/en/products/detail/avx-corporation/0603YC101KAT2A/1600476
  C18: Dimensions=1.6x0.81x0.9mm
C20 C21 C22 C24 C25 C26: library part "Capacitor 1210", "100µF ±20% 6.3V Ceramic Capacitor X5R 1210 (3225 Metric)", ComponentLink1Description=Digikey, ComponentLink1URL=https://www.digikey.com/en/products/detail/murata-electronics/GRM32ER60J107ME20K/2548458?s=N4IgTCBcDaIOICUCyBmMBRBA2ADAKQEYcB2JdMHAaRAF0BfIA, Dimensions=3.2x2.5x2.7mm
C23 C27 C28: library part "Capacitor 2917 Panasonic", "470µF Molded Tantalum Polymer Capacitor 4V 2917 (7343 Metric) 12mOhm @ 100kHz", ComponentLink1Description=Digikey, ComponentLink1URL=https://www.digikey.com/en/products/detail/panasonic-electronic-components/4TPE470MCL/4146614?s=N4IgTCBcDaICwBUAKBROB2ADAWQMIBkQBdAXyA
C30 C36: library part "Capacitor 1206", "4.7µF ±10% 50V Ceramic Capacitor X5R 1206 (3216 Metric)", ComponentLink1Description=Digikey, ComponentLink1URL=https://www.digikey.com/en/products/detail/taiyo-yuden/UMK316BJ475KL-T/1646591?s=N4IgTCBcDaIKoFkDSBmAjANgEICkAsA7AKxIAyAtACogC6AvkA, Dimensions=3.2x1.6x1.8mm
C31: library part "Capacitor 1210", "CAP CER 100UF 10V X5R 1210", ComponentLink1Description=Digikey, ComponentLink1URL=https://www.digikey.com/en/products/detail/taiyo-yuden/LMK325BJ107MM-T/1646594?s=N4IgTCBcDaIDIFkDSBmMBWAQgKQIwAYB2BBAWgBUQBdAXyA
C32: library part "Capacitor 1210", "Cap 1210"
C34: library part "Capacitor 1210", "CAP CER 10UF 50V X7R 1210", ComponentLink1Description=Digikey, ComponentLink1URL=https://www.digikey.com/en/products/detail/murata-electronics/GRM32ER71H106KA12L/2548481?s=N4IgTCBcDaIOICUCyBmMBRBB2AjACRwAYA2AaQEEcwAZEAXQF8g
C35: library part "Capacitor 1206", "47µF ±20% 25V Ceramic Capacitor X5R 1206 (3216 Metric)", ComponentLink1Description=Digikey, ComponentLink1URL=https://www.digikey.com/en/products/detail/taiyo-yuden/UMK316BJ475KL-T/1646591?s=N4IgTCBcDaIKoFkDSBmAjANgEICkAsA7AKxIAyAtACogC6AvkA, Dimensions=3.2x1.6x1.8mm
C37 C38: library part "Capacitor 0603 TDK", "CAP CER 0.1UF 25V X7R 0603", ComponentLink1Description=Digikey
  C37: ComponentLink1URL=https://www.digikey.com/en/products/detail/tdk-corporation/C1608X7R1E104K080AA/513803?s=N4IgTCBcDaIMIEYBsAGAHADQOwCUEFEEUAWAaXRQEFKACEAXQF8g
  C38: ComponentLink1URL=https://www.digikey.com/en/products/detail/tdk-corporation/C1608X7R1E104K080AA/513803?s=N4IgTCBcDaIMIEYBsAGAHADQOwCUEFEEUAWAaXRQEFKQBdAXyA
C39: library part "Capacitor 1206 2.3mmHeight", "47µF ±20% 6.3V Ceramic Capacitor X5R 1206 (3216 Metric)", ComponentLink1Description=Digikey, ComponentLink1URL=https://www.digikey.com/en/products/detail/avx-corporation/12066D476MAT4A/8107694?s=N4IgTCBcDaIIxgAwDZkBEAsB2ZBZAggCob4gC6AvkA, Dimensions=3.2x1.6x2.3mm
C40: library part "Capacitor 1206 2.3mmHeight"
D2 D3: library part "Schotkky Diode", "Diode Schottky 50V 4A Surface Mount DO-221BC (SMPA)", ComponentLink1Description=Digikey, ComponentLink1URL=https://www.digikey.com/en/products/detail/vishay-general-semiconductor-diodes-division/V8PAL50-M3-I/4580781
H1 H2 H3 H4 H5 H6 H7 H8 H9 H10: library part "Header - 2Pin", "Connector Header Through Hole 2 position 0.100\" (2.54mm)", ComponentLink1Description=Digikey, ComponentLink1URL=https://www.digikey.com/en/products/detail/amphenol-icc-fci/68001-202HLF/2023308
J1: "CONN HEADER VERT 10POS 2.54MM", ComponentLink1Description=Digikey, ComponentLink1URL=https://www.digikey.com/en/products/detail/samtec-inc/IPT1-105-01-L-D/6561590
J2: "15x2 Pin Connector CONN HEADER VERT 30POS 2.54MM", ComponentLink1Description=Digikey, ComponentLink1URL=https://www.digikey.com/en/products/detail/samtec-inc/IPT1-115-01-L-D/6693479
J3: "5x2 Pin connector", ComponentLink1Description=Samtec, ComponentLink1URL=https://www.samtec.com/products/ipl1
L1: library part LED, "Red 631nm LED Indication - Discrete 2V 0603 (1608 Metric)", ComponentLink1Description=Digikey, ComponentLink1URL=https://www.digikey.com/en/products/detail/lite-on-inc/LTST-C191KRKT/386837?s=N4IgTCBcDaIDIBUDKCC0BhAjATkwaQCU8EQBdAXyA
R1 R3: library part "ERJ2G Resistor 0402", "Jumper 0.063W, 1/16W Chip Resistor 0402 (1005 Metric) Automotive AEC-Q200 Thick Film", ComponentLink1Description=Digikey, ComponentLink1URL=https://www.digikey.com/en/products/detail/vishay-dale/CRCW04020000ZSTD/1226552
R2 R4 R15 R16 R19 R20 R24 R25 R29 R33 R34: library part "ERJ2G Resistor 0402", "Resistor 0402"
R5: library part "Resistor 0603", "120 kOhms ±0.1% 0.1W, 1/10W Chip Resistor 0603 (1608 Metric) Automotive AEC-Q200 Thin Film", ComponentLink1Description=Digikey, ComponentLink1URL=https://www.digikey.com/en/products/detail/panasonic-electronic-components/ERA-3AEB124V/1465904
R6 R28: library part "Resistor 0603", "RES SMD 825 OHM 0.1% 1/10W 0603", ComponentLink1Description=Digikey, ComponentLink1URL=https://www.digikey.com/en/products/detail/panasonic-electronic-components/ERA-3AEB8250V/2026741?s=N4IgTCBcDaIKICUCCBaAzEuAhAHGArAAwBqIAugL5A
R7: library part "Resistor 0603", "22.6 kOhms ±0.1% 0.1W, 1/10W Chip Resistor 0603 (1608 Metric) Automotive AEC-Q200 Thin Film", ComponentLink1Description=Digikey, ComponentLink1URL=https://www.digikey.com/en/products/detail/panasonic-electronic-components/ERA-3AEB2262V/2026868?s=N4IgjCBcoMxaBjKAzAhgGwM4FMA0IB7KAbRAHYYIBdfABwBcoQBlegJwEsA7AcxAF98YAGzwQSSGix5CJEDACcAJgAsomiAZNWnXgKEKAHArESpOfEUikADCA1bILdtz6CQSm4YCsplBgtZaw8lADphAAIAawB5AAsAW0x7OkYnAFUuDnoY5ABZbFRMAFc2bH0QAFolP0h2YpkrUl8HNJAKypVa80a5MENhBRbUpgF%2BfiA
R8: library part "Resistor 0603", "16.5 kOhms ±0.1% 0.1W, 1/10W Chip Resistor 0603 (1608 Metric) Automotive AEC-Q200 Thin Film", ComponentLink1Description=Digikey, ComponentLink1URL=https://www.digikey.com/en/products/detail/panasonic-electronic-components/ERA-3AEB1652V/2026856
R9 R10: library part "ERJ2G Resistor 0402", "49.9 ±0.1% 0.063W, 1/16W Chip Resistor 0402 (1005 Metric) Automotive AEC-Q200 Thin Film", ComponentLink1Description=Digikey, ComponentLink1URL=https://www.digikey.com/en/products/detail/panasonic-electronic-components/ERA-2AEB4992X/2026206?s=N4IgjCBcoMxaBjKAzAhgGwM4FMA0IB7KAbRAHYYIBdfABwBcoQBlegJwEsA7AcxAF98YAGzwQSSGix5CJEDACcYAKwAOEDRAMmrTrwH4ATAAZVysRKk58RSKQAsCgHQKABAGsA8gAsAtpg06RkgQAFUuDnpPZABZbFRMAFc2bAMQAFpDCyh2RJlbUnNNbRC09PtsyQxrWTtwVWEFCuLgkAF%2BfiA
R11 R13 R30: library part "ERJ2G Resistor 0402", "RES SMD 10K OHM 5% 1/10W 0402", ComponentLink1Description=Digikey, ComponentLink1URL=https://www.digikey.com/en/products/detail/panasonic-electronic-components/ERJ-2GEJ103X/146735?s=N4IgTCBcDaIKICUBSBaMBxOSCMAGAzABogC6AvkA
R12 R14 R38: library part "ERJ2G Resistor 0402", "RES SMD 1K OHM 5% 1/10W 0402", ComponentLink1Description=Digikey, ComponentLink1URL=https://www.digikey.com/en/products/detail/panasonic-electronic-components/ERJ-2GEJ102X/146898?s=N4IgTCBcDaIKICUBSBaMBxOSCMAGMAGiALoC%2BQA
R17: library part "Resistor 0603", "33 ±0.1% 0.1W, 1/10W Chip Resistor 0603 (1608 Metric) Automotive AEC-Q200 Thin Film", ComponentLink1Description=Digikey, ComponentLink1URL=https://www.digikey.com/en/products/detail/panasonic-electronic-components/ERA-3AEB333V/1465890
R23: library part "ERJ2G Resistor 0402", "RES 15K OHM 1% 1/10W 0402 SMD", ComponentLink1Description=Digikey, ComponentLink1URL=https://www.digikey.com/en/products/detail/panasonic-electronic-components/ERJ-U02F1502X/11630567?s=N4IgTCBcDaIKICUBSBaAqgBjAMQIwFYsANEAXQF8g
R26: library part "Resistor 0603", "RES SMD 17.8K OHM 0.1% 1/5W 0603", ComponentLink1Description=Digikey, ComponentLink1URL=https://www.digikey.com/en/products/detail/panasonic-electronic-components/ERJ-PB3B1782V/6212895?s=N4IgTCBcDaIKICUBSBaACgIQMwYIwHYAOMANRAF0BfIA
R27: library part "Resistor 0603", "RES SMD 130K OHM 0.1% 1/10W 0603", ComponentLink1Description=Digikey, ComponentLink1URL=https://www.digikey.com/en/products/detail/panasonic-electronic-components/ERA-3AEB134V/1465905?s=N4IgTCBcDaIKICUCCBaAzEuAhAjGgLAGogC6AvkA
R31: library part "ERJ2G Resistor 0402", "RES SMD 100K OHM 1% 1/10W 0402", ComponentLink1Description=Digikey, ComponentLink1URL=https://www.digikey.com/en/products/detail/panasonic-electronic-components/ERJ-2RKF1003X/192081?s=N4IgTCBcDaIKICUBSBaMCDSAxAjABjwGYANEAXQF8g
R32: library part "ERJ2G Resistor 0402", "RES, Thick Film, 4.99 kOhm, 1.0 %, 1/16 W, SMD, 0402", ComponentLink1Description=Digikey, ComponentLink1URL=https://www.digikey.com/en/products/detail/vishay-dale/CRCW04024K99FKED/1178086
R35: library part "Resistor 0603", "64.9 ±0.1% 0.2W, 1/5W Chip Resistor 0603 (1608 Metric) Automotive AEC-Q200, Pulse Withstanding Thick Film", ComponentLink1Description=Digikey, ComponentLink1URL=https://www.digikey.com/en/products/detail/panasonic-electronic-components/ERJ-PB3B6492V/6212962
R36: library part "Resistor 0603", "RES SMD 45.3KOHM 0.1% 1/10W 0603", ComponentLink1Description=Digikey, ComponentLink1URL=https://www.digikey.com/en/products/detail/panasonic-electronic-components/ERA-3AEB4532V/2026897?s=N4IgTCBcDaIKICUCCBaAzEuAhALAVjTADUQBdAXyA
R37: library part "Resistor 0603", "RES SMD 300 OHM 0.1% 1/10W 0603", ComponentLink1Description=Digikey, ComponentLink1URL=https://www.digikey.com/en/products/detail/panasonic-electronic-components/ERA-3AEB301V/1465841?s=N4IgTCBcDaIKICUCCBaAzEuAhNAGAjAGogC6AvkA
U1: library part "LTM4646IY 05-11-0399"
U2: library part LTM8033, "Non-Isolated PoL Module DC DC Converter Output 0.8 ~ 24V - - 3A 3.6V - 36V Input", ComponentLink1Description=Digikey, ComponentLink1URL=https://www.digikey.com/en/products/detail/analog-devices-inc/LTM8033EY-PBF/4964717
U3: library part LTM8045, "Non-Isolated PoL Module DC DC Converter Output -2.5 ~ -15V, 2.5 ~ 15V - - 700mA 2.8V - 18V Input", ComponentLink1Description=Digikey, ComponentLink1URL=https://www.digikey.com/en/products/detail/analog-devices-inc/LTM8045IY-PBF/3883289

## Free pads (board coordinates)
  round 3.81 hole 2.8: 1(4,4) 2(4,66) 3(66,66) 4(66,4)

## Via types
v1: diameter 0.508, hole 0.254, Top Layer to Bottom Layer, tented both sides, 382 vias

## Nets (pads, with @x,y where several pads share a name; then routed paths per layer and width w, separated by ;. In a path a pad name is that pad's centre, name@x,y a point inside that pad or via, vN(x,y) a via of type N, cw(c..) or ccw(c..) an arc to the next point about the centre after c; other vN are vias at no path point)
0.9V: C24.1 C25.1 C26.1 C27.1 C28.1 H1.1 J2.7 J2.8 J2.9 J2.10 R19.1 U1.H1 U1.J1 U1.J2 U1.K1 U1.K2 U1.L1 U1.L2 | length 30.4
  Top Layer w0.254: v1(46.558,40.792) U1.L2@47.193,40.157 U1.K2@48.463,40.157 ; v1(46.558,42.062) U1.L1@47.193,41.427 ; v1(47.828,40.792) U1.K2@48.463,40.157 ; v1(47.828,42.062) U1.K1@48.463,41.427 U1.J1@49.733,41.427 v1(49.098,42.062) ; v1(49.098,40.792) U1.J2@49.733,40.157 U1.K2@48.463,40.157
  Top Layer w0.508: U1.J1@49.733,41.427 U1.H1@51.003,41.427
  Signal w0.254: J2.8@51.403,63.752 52.579,64.928 60.421,64.928 61.087,64.262 61.087,61.253 H1.1@64.53,57.81
  Bottom Layer w0.254: v1(49.098,42.062) 49.827,42.062 R19.1@50.47,42.705
  other v1: 48.717,44.044 48.717,45.06 48.717,46.076 48.653,46.934 48.653,47.95 48.653,48.966 51.054,55.88 51.054,56.642 51.054,57.404 51.054,58.166
0.9V_PGood: J3.4 R12.1 | length 53.9
  Signal w0.178: J3.4@19.558,6.858 19.736,7.036 20.587,7.036 21.514,7.963 28.537,7.963 30.5,6 34,6 36,8 47.75,8 49,9.25 49,25.25 49.5,25.75 50.861,25.75 51.122,26.011 v1(52.489,26.011)
  Bottom Layer w0.178: v1@52.5,26.011 52.5,28.032 R12.1@52.502,28.034
2.2V: C20.1 C21.1 C22.1 C23.1 H2.1 J2.13 J2.14 J2.15 J2.16 U1.A1 U1.A2 U1.B1 U1.B2 U1.C1 U1.C2 U1.D1 U1.E2 | length 34.1
  Top Layer w0.254: U1.E2@54.813,40.157 v1(55.448,40.792) ; U1.C2@57.353,40.157 v1(57.988,40.792) ; U1.C1@57.353,41.427 v1(57.988,42.062) ; U1.B2@58.623,40.157 v1(59.258,40.792) ; U1.B1@58.623,41.427 v1(59.258,42.062) ; U1.A2@59.893,40.157 v1(60.528,40.792) ; U1.A1@59.893,41.427 v1(60.528,42.062)
  Top Layer w0.508: v1(55.448,40.792) U1.D1@56.083,41.427 U1.C1@57.353,41.427
  Signal w0.254: J2.13@43.783,66.643 J2.13@43.783,66.292 44.882,67.392 60.624,67.392 62.192,65.824 62.192,63.425 H2.1@64.555,61.062
  other v1: 60.96,43.993 60.96,45.009 60.96,46.025 61.015,47.648 61.015,48.664 40.945,55.524 40.945,56.413 40.945,57.252 40.919,58.09
2.2V_PGood: J3.9 R14.1 | length 59.7
  Signal w0.178: J3.9@19.558,4.318 19.609,4.267 20.587,4.267 21.64,3.213 28.016,3.213 29.781,4.978 33.635,4.978 33.694,4.919 50.669,4.919 51.75,6 51.75,24.25 52.5,25 55.744,25 v1(55.752,24.992)
  Bottom Layer w0.178: R14.1@55.593,28.194 55.593,25.157 v1@55.75,25
3.8VPGOOD: J3.5 R31.2 U2.B7 | length 33
  Top Layer w0.178: U2.B7@35.689,18.44 36.324,19.075 39.091,19.075 R31.2@39.522,19.507
  Top Layer w0.203: v1(35.079,19.05) U2.B7@35.689,18.44
  Signal w0.203: J3.5@17.018,6.858 17.125,6.965 18.085,6.965 19.527,8.407 27,8.407 28,9.407 28,16 29,17 34.5,17 35.079,17.579 v1(35.079,19.05)
  Bottom Layer w0.203: v1(35.079,19.05) v1@35.104,19.05
3.8VRUN: C33.1 R23.1 R24.1 R25.2 U2.G8 | length 16.6
  Top Layer w0.254: v1(29.313,16.332) 29.326,16.345 29.326,17.158 U2.G8@29.339,17.17
  Signal w0.178: v1(29.313,16.332) 29.313,8.634 30.937,7.01 v1@31.42,7.01
  Bottom Layer w0.178: v1(31.407,7.001) 31.407,6.134 C33.1@31.471,6.071 31.471,4.953 R25.2@31.801,4.623 31.656,4.478 R24.1@31.656,3.251 31.682,3.226 R23.1@32.944,3.226
+3.8V: C31.1 C32.1 H10.1 J2.19 J2.20 J2.21 J2.22 U2.A1 U2.A2 U2.A3 U2.B1 U2.B2 U2.B3 U2.C1 U2.C2 U2.C3 U2.D1 U2.D2 U2.D3 | length 32.2
  Top Layer w0.254: U2.D3@33.149,23.52 v1(33.784,24.155) ; U2.D2@33.149,24.79 v1(33.784,24.155) ; U2.D1@33.149,26.06 v1(33.784,25.425) ; U2.C3@34.419,23.52 v1(35.054,24.155) U2.B2@35.689,24.79 ; U2.C2@34.419,24.79 v1(33.784,24.155) ; U2.C1@34.419,26.06 35.003,25.476 v1(35.054,25.476) ; U2.B3@35.689,23.52 v1(36.324,24.155) ; U2.B1@35.689,26.06 36.273,25.476 36.349,25.476 36.933,26.06 U2.A1@36.959,26.06 ; U2.A3@36.959,23.52 v1(36.324,24.155) ; U2.A2@36.959,24.79 v1(36.324,24.155)
  Signal w0.178: H10.1@14.351,64.135 17.272,64.135 20.193,61.214 31.084,61.214 J2.22@33.623,63.752
  other v1: 37.814,24.102 37.814,25.372 36.37,25.467 35.083,26.848 33.75,26.896 36.29,26.896 37.814,26.896 36.019,28.524 36.019,29.439 36.019,30.251
-3.8V: C39.1 C40.1 H9.1 J2.25 J2.26 J2.27 J2.28 R37.1 U3.A4 U3.A5 U3.B4 U3.B5 | length 18.8
  Top Layer w0.178: U3.A5@27.534,46.634 27.534,48.843 27.814,49.124
  Signal w0.178: H9.1@11.125,64.135 12.522,65.532 16.891,65.532 17.399,65.024 24.731,65.024 J2.28@26.003,63.752
  other v1: 28.448,45.212 26.924,45.974 28.448,46.736 27.908,47.47 25.908,47.498 26.924,47.498 28.169,48.92 28.148,49.753 27.661,50.571 27.686,51.308 27.686,52.07
-3.8VRun: C37.1 R32.1 R33.1 R34.2 U3.G3 | length 10.6
  Top Layer w0.178: U3.G3@24.994,39.014 v1(25.629,38.379)
  Bottom Layer w0.178: R33.1@22.125,37.195 R33.1@22.047,37.117 22.047,38.329 22.733,39.014 24.994,39.014 v1(25.629,38.379) 25.629,38.304 25.476,38.151 C37.1@25.476,37.033 ; R34.2@25.205,35.763 25.476,36.035 C37.1@25.476,37.033 ; R32.1@26.975,37.059 26.949,37.033 C37.1@25.476,37.033
ADJ: R27.2 U2.A7 | length 3.1
  Top Layer w0.254: U2.A7@36.959,18.44 39.045,18.44 39.653,17.832 R27.2@39.778,17.832
BIAS: R31.1 U2.G3 U2.G4 | length 14.9
  Top Layer w0.254: v1(28.246,23.114) 28.256,23.114 28.663,23.52 U2.G3@29.339,23.52 U2.G4@29.339,22.25 ; v1(38.583,20.65) 38.605,20.629 39.501,20.629 R31.1@39.522,20.607
  Signal w0.254: v1(28.246,23.114) 29.034,22.327 36.832,22.327 38.508,20.65 v1(38.583,20.65) v1@38.659,20.65
ClockOUT: H8.1 U1.F4 | length 29.5
  Top Layer w0.254: v1(53.035,37.109) U1.F4@53.543,37.617
  Signal w0.178: v1(53.035,37.109) 52.375,36.449 52.375,35.375 54.367,33.383 54.367,33.367 54.788,32.947 54.788,31.212 v1@55,31 ; v1(55.002,30.992) 56.744,29.25 61.219,29.25 61.75,28.719 61.75,18.21 H8.1@63.96,16
COMP1: C18.1 U1.G1 U1.G3 | length 5.4
  Top Layer w0.254: v1(51.638,42.062) U1.G1@52.273,41.427 ; v1(51.765,39.395) U1.G3@52.273,38.887
  Bottom Layer w0.254: v1(51.638,42.062) 51.638,42.037 52.375,41.3 52.375,40.704 52.432,40.646 52.432,40.049 C18.1@52.705,39.776 52.432,39.503 51.942,39.503 51.834,39.395 v1(51.765,39.395)
COMP2: C19.1 U1.E1 U1.E3 | length 13.7
  Top Layer w0.254: U1.E3@54.813,38.887 v1(55.448,39.522) ; U1.E1@54.813,41.427 v1(55.448,42.062)
  Signal w0.178: v1(55.448,42.062) 56.286,42.901 62.431,42.901 62.431,42.869 62.548,42.752 v1(62.548,42.663)
  Signal w0.254: v1(55.448,39.522) 54.508,40.462 54.508,41.097 55.448,42.037 v1(55.448,42.062)
  Bottom Layer w0.178: v1(62.548,42.663) 62.548,43.574 C19.1@62.56,43.586
DRVCC: C15.1 U1.G7 | length 7.2
  Top Layer w0.254: v1(51.638,33.172) U1.G7@52.273,33.807
  Signal w0.178: v1@51.359,30.734 v1(51.333,30.734) 51.867,31.267 53.162,31.267 53.492,31.598 53.492,32.182 52.502,33.172 v1(51.638,33.172)
  Bottom Layer w0.178: C15.1@50.546,30.505 50.775,30.734 v1(51.333,30.734)
  Bottom Layer w0.254: v1(51.638,33.172) v1@51.701,33.172
EN_0.9V_SPARE: J3.8 R2.2 | length 50.5
  Signal w0.178: J3.8@22.098,4.318 22.098,4.348 23.084,5.334 23.114,5.334 23.368,5.588 33.528,5.588 33.841,5.275 50.522,5.275 51.25,6.003 v1@51.25,25
  Bottom Layer w0.178: v1(51.288,25.078) 51.288,26.261 R2.2@51.435,26.408
Enable_0V9: J1.09 R1.2 | length 32.9
  Signal w0.178: J1.09@36.207,6.379 37.328,7.5 48.318,7.5 49.993,9.175 v1(49.993,25.039)
  Bottom Layer w0.178: R1.2@49.116,26.746 49.116,25.917 v1(49.993,25.039)
FB: R36.2 U3.A3 | length 4.1
  Top Layer w0.178: R36.2@22.809,49.124 22.809,48.999 23.624,48.184 24.839,48.184 24.943,48.08 24.943,46.685 U3.A3@24.994,46.634
FIN: C34.1 U2.J8 U2.K8 U2.L8 | length 1.1
  Top Layer w0.254: U2.J8@26.799,17.17 26.799,16.459 27.027,16.231 v1(27.027,16.129)
  other v1: 19.839,16.078 20.728,16.078 21.617,16.078 23.59,16.228 24.86,16.228 26.13,16.228
FSET: R17.2 U1.F1 | length 2
  Top Layer w0.254: U1.F1@53.543,41.427 v1(53.543,42.062)
  Bottom Layer w0.254: v1(53.543,42.062) 53.592,42.014 53.592,41.56 54.129,41.022 R17.2@54.254,41.022
GND: C1.2 C2.2 C3.2 C4.2 C5.2 C6.2 C7.2 C8.2 C9.2 C14.2 C15.2 C20.2 C21.2 C22.2 C23.2 C24.2 C25.2 C26.2 C27.2 C28.2 C29.2 C30.2 C31.2 C32.2 C33.2 C34.2 C35.2 C36.2 C37.2 C38.2 C39.2 C40.2 C41.2 H1.2 H2.2 H3.2 H4.2 H5.2 H6.2 H7.2 H8.2 H9.2 H10.2 J1.01 J1.02 J1.07 J1.08 J2.5 J2.6 J2.11 J2.12 J2.17 J2.18 J2.23 J2.24 J2.29 J2.30 J3.1 J3.6 J3.10 L1.2 pad.1 pad.2 pad.3 pad.4 R20.1 R25.1 R26.1 R28.1 R30.1 R34.1 R35.1 U1.A3 U1.A6 U1.A7 U1.B3 U1.B6 U1.B7 U1.C3 U1.C4 U1.C5 U1.C6 U1.C7 U1.D6 U1.D7 U1.E6 U1.E8 U1.F5 U1.F7 U1.G6 U1.G8 U1.H6 U1.H7 U1.J4 U1.J5 U1.J6 U1.J7 U1.K3 U1.K6 U1.K7 U1.L3 U1.L6 U1.L7 U2.A4 U2.A5 U2.A8 U2.B4 U2.B5 U2.C4 U2.C5 U2.C6 U2.C7 U2.C8 U2.D4 U2.D5 U2.D6 U2.D7 U2.D8 U2.E1 U2.E2 U2.E3 U2.E4 U2.E5 U2.E6 U2.E7 U2.E8 U2.F1 U2.F2 U2.F3 U2.F4 U2.F5 U2.F6 U2.F7 U2.F8 U2.G1 U2.G2 U2.G5 U2.G6 U2.G7 U2.H5 U2.H6 U2.J5 U2.J6 U2.K5 U2.K6 U2.L5 U2.L6 U3.A1 U3.A2 U3.B1 U3.B2 U3.B3 U3.C1 U3.C2 U3.C3 U3.C4 U3.C5 U3.D1 U3.D2 U3.D3 U3.D4 U3.D5 U3.E1 U3.E2 U3.E3 U3.E4 U3.E5 U3.F2 U3.F3 U3.F4 U3.F5 U3.G2 U3.H1 U3.H2 U3.H3 | length 138.9
  Top Layer w0.254: v1(1.837,1.837) 2.028,1.837 2.752,2.561 ; v1(2,7) 2,6.931 pad.1@3.869,5.063 ; 3.869,6.731 pad.1@3.869,5.063 ; 4,5.905 pad.1@4,4.453 ; R35.1@20.523,37.44 22.004,37.44 22.309,37.744 U3.H1@22.454,37.744 v1(23.089,38.379) ; C38.2@20.523,41.783 20.752,41.554 U3.E1@22.454,41.554 v1(23.089,40.919) ; U3.D1@22.454,42.824 v1(23.089,42.189) U3.D2@23.724,42.824 ; U3.C1@22.454,44.094 v1(23.089,43.459) ; U3.B1@22.454,45.364 v1(23.089,44.729) ; U3.A1@22.454,46.634 v1(23.089,45.999) U3.A2@23.724,46.634 ; U3.H2@23.724,37.744 v1(23.089,38.379) ; U3.F2@23.724,40.284 v1(24.359,39.649) U3.F3@24.994,40.284 ; U3.E2@23.724,41.554 v1(24.359,40.919) ; U3.C2@23.724,44.094 v1(24.359,43.459) ; U3.B2@23.724,45.364 v1(24.359,44.729) U3.B3@24.994,45.364 ; U2.L6@24.259,19.71 24.843,19.126 v1(24.894,19.126) ; U2.L5@24.259,20.98 24.843,20.396 v1(24.894,20.396) 24.944,20.396 U2.K5@25.529,20.98 ; v1(24.359,42.189) U3.D3@24.994,42.824 ; U3.H3@24.994,37.744 v1(24.359,38.379) U3.G2@23.724,39.014 v1(23.089,38.379) ; U3.E3@24.994,41.554 v1(25.629,40.919) ; U3.C3@24.994,44.094 v1(25.629,43.459) ; U2.K6@25.529,19.71 26.113,19.126 v1(26.164,19.126) ; v1(25.629,39.649) U3.F4@26.264,40.284 ; v1(25.629,42.189) U3.D4@26.264,42.824 ; v1(26.164,20.396) 26.214,20.396 U2.J5@26.799,20.98 ; U3.E4@26.264,41.554 v1(26.899,40.919) U3.E5@27.534,41.554 ; U3.C4@26.264,44.094 v1(26.899,43.459) U3.C5@27.534,44.094 ; U2.J6@26.799,19.71 27.383,19.126 v1(27.434,19.126) ; v1(26.899,39.649) U3.F5@27.534,40.284 ; v1(26.899,42.189) U3.D5@27.534,42.824 ; v1(27.434,20.396) 27.484,20.396 U2.H5@28.069,20.98 ; U2.H6@28.069,19.71 v1(28.704,19.075) ; v1(28.704,20.345) U2.G5@29.339,20.98 ; U2.G7@29.339,18.44 v1(29.974,17.805) ; U2.G6@29.339,19.71 v1(29.974,19.075) ; U2.G2@29.339,24.79 29.923,24.206 v1(29.974,24.206) ; U2.G1@29.339,26.06 29.969,25.43 v1(29.974,25.43) ; v1(29.974,20.345) U2.F5@30.609,20.98 ; U2.F8@30.609,17.17 30.609,16.51 30.837,16.281 ; U2.F7@30.609,18.44 v1(31.244,17.805) ; U2.F6@30.609,19.71 v1(31.244,19.075) ; U2.F4@30.609,22.25 31.23,21.629 v1(31.233,21.629) ; U2.F3@30.609,23.52 31.103,23.026 31.384,23.026 U2.E3@31.879,23.52 ; U2.F2@30.609,24.79 v1(31.218,24.181) 31.269,24.181 U2.E2@31.879,24.79 ; U2.F1@30.609,26.06 v1(31.244,25.425) U2.E1@31.879,26.06 ; v1(31.244,20.345) U2.E5@31.879,20.98 ; U2.E8@31.879,17.17 31.879,16.463 31.98,16.362 v1(31.98,16.307) ; U2.E7@31.879,18.44 v1(32.514,17.805) ; U2.E6@31.879,19.71 v1(32.514,19.075) ; U2.E4@31.879,22.25 32.463,21.666 v1(32.514,21.666) ; v1(32.514,20.345) U2.D5@33.149,20.98 ; U2.D8@33.149,17.17 33.149,16.463 33.25,16.362 v1(33.25,16.307) ; U2.D7@33.149,18.44 v1(33.784,17.805) U2.C7@34.419,18.44 ; U2.D6@33.149,19.71 v1(33.784,19.075) ; U2.D4@33.149,22.25 33.758,21.641 v1(33.784,21.641) ; v1(34.403,16.236) 34.411,16.244 34.411,17.163 U2.C8@34.419,17.17 ; U2.C6@34.419,19.71 v1(33.784,20.345) U2.C5@34.419,20.98 ; U2.C4@34.419,22.25 35.003,21.666 v1(35.054,21.666) ; U2.B5@35.689,20.98 36.298,21.59 v1(36.298,21.641) ; U2.B4@35.689,22.25 v1(36.298,21.641) ; U2.A8@36.959,17.17 37.529,16.6 37.529,16.371 v1(37.568,16.332) 37.568,16.263 37.77,16.062 R30.1@37.77,14.884 ; U2.A4@36.959,22.25 36.349,21.641 v1(36.298,21.641) ; v1(40.894,34.76) 41.796,34.76 C8.2@41.859,34.823 ; v1(46.558,33.172) U1.L7@47.193,33.807 ; v1(46.558,34.442) U1.L6@47.193,35.077 ; v1(46.558,38.887) U1.L3@47.193,38.887 ; v1(47.828,33.172) U1.K7@48.463,33.807 ; v1(47.828,34.442) U1.K6@48.463,35.077 ; v1(47.828,38.887) U1.K3@48.463,38.887 ; v1(49.098,33.172) U1.J7@49.733,33.807 ; v1(49.098,34.442) U1.J6@49.733,35.077 U1.J5@49.733,36.347 49.733,37.236 ; v1(50.368,33.172) U1.H7@51.003,33.807 ; v1(50.368,34.442) U1.H6@51.003,35.077 ; v1(51.638,34.442) U1.G6@52.273,35.077 ; U1.F5@53.543,36.347 U1.E6@54.813,35.077 U1.D6@56.083,35.077 v1(56.718,34.442) ; U1.E8@54.813,32.537 54.82,32.537 55.455,31.902 v1(55.461,31.902) ; U1.D7@56.083,33.807 v1(56.718,33.172) ; U1.C7@57.353,33.807 v1(57.988,33.172) ; U1.C5@57.353,36.347 U1.C6@57.353,35.077 v1(57.988,34.442) ; U1.C4@57.571,37.836 v1(57.988,38.252) ; U1.B7@58.623,33.807 v1(59.258,33.172) ; U1.B6@58.623,35.077 58.642,35.077 59.277,34.442 v1(59.296,34.442) ; U1.A7@59.893,33.807 59.9,33.807 60.535,33.172 v1(60.541,33.172) ; U1.A6@59.893,35.077 v1(60.528,35.077) ; pad.4@65.655,4.195 68.019,1.831 v1(68.019,1.702) ; v1(67.208,36.017) 66.815,36.411 C2.2@66.307,36.411 ; v1(67.234,37.033) 66.929,37.033 C2.2@66.307,36.411 ; v1(67.234,37.821) 66.307,36.893 C2.2@66.307,36.411 ; 2.752,2.561 4,3.809 pad.1@4,4.131 ; 2.752,2.561 pad.1@4.322,4.131 ; pad.1@3.869,4.584 pad.1@3.869,5.063 ; pad.1@3.869,4.584 pad.1@4,4.453 ; pad.1@3.869,4.584 3.869,4.262 pad.1@4,4.131 ; pad.1@4,4.131 pad.1@4.322,4.131 ; pad.1@4,4.131 pad.1@4,4.453 ; pad.1@4,4.453 pad.1@4.322,4.131
  Top Layer w0.508: U1.K3@48.463,38.887 49.468,37.882 49.468,37.236 ; v1(51.638,31.902) U1.G8@52.273,32.537 U1.F7@53.543,33.807 ; U1.C5@57.353,36.347 57.396,36.39 57.396,36.69 57.404,36.698 57.404,37.617 57.404,37.789 U1.C4@57.511,37.896
  Top Layer w0.762: U1.C4@57.531,37.916 57.531,38.589 57.353,38.767 U1.C3@57.353,38.887 U1.B3@58.623,38.887 U1.A3@59.893,38.887 v1(60.528,38.887)
  Signal w0.254: pad.4@65.75,4.25 pad.4@66,4
  Bottom Layer w0.178: v1@50.19,27.838 50.546,28.194 C15.2@50.546,28.905
  Bottom Layer w0.254: v1(23.089,38.379) 23.127,38.341 23.127,37.782 C37.2@23.876,37.033 24.105,36.805 R34.1@24.105,35.763 ; R25.1@32.901,4.623 32.901,5.901 C33.2@33.071,6.071 v1@33.071,7.264 ; R20.1@43.783,39.173 43.764,39.192 46.185,39.192 46.489,38.887 v1(46.558,38.887) ; v1@51.59,31.854 v1(51.638,31.902) ; v1(51.638,34.442) v1@51.707,34.442 ; C14.2@55.651,35.382 55.924,35.655 56.592,35.655 56.649,35.712 v1(56.718,35.712)
  other v1: 7,2 12,2 17,2 22,2 27,2 32,2 37,2 42,2 47,2 52,2 57,2 62,2 68,7 33.073,7.262 2,12 68,12 56.527,15.946 56.527,16.708 2,17 68,17 56.527,17.47 56.527,18.232 56.527,20.518 56.527,21.28 19.839,21.666 20.728,21.666 21.617,21.666 24.86,21.816 26.13,21.816 27.432,21.844 2,22 68,22 56.527,22.042 56.527,22.804 31.244,22.987 2,27 68,27 50.202,27.895 30.583,28.524 30.583,29.439 30.583,30.251 39.853,31.902 2,32 68,32 39.853,32.791 39.853,33.68 65.786,34.722 39.827,36.093 20.527,36.645 39.827,36.982 2,37 68,37 39.827,37.871 31.964,41.94 32.726,41.94 29.156,41.956 30.172,41.956 31.188,41.956 2,42 68,42 20.474,42.63 54.331,43.967 55.22,43.967 54.331,44.983 55.22,44.983 54.331,45.999 55.22,45.999 55.332,46.766 54.331,46.787 2,47 68,47 23.082,47.216 55.332,47.782 54.331,47.803 55.332,48.798 54.331,48.819 21.971,50.292 21.971,51.181 2,52 68,52 21.971,52.07 47.142,55.55 53.813,55.634 53.848,56.388 47.142,56.413 2,57 68,57 53.848,57.15 47.168,57.404 53.848,57.912 47.168,58.318 2,62 68,62 7,68 12,68 17,68 22,68 27,68 32,68 37,68 42,68 47,68 52,68 57,68 62,68
INTVCC: C14.1 R9.2 R10.2 R11.2 R13.2 U1.D2 U1.F3 U1.F6 | length 38.4
  Top Layer w0.254: v1(53.035,35.712) U1.F6@53.543,35.077 ; U1.F3@53.543,38.887 v1(54.051,38.379) ; U1.D2@56.083,40.157 v1(56.591,39.776)
  Signal w0.178: v1(55.002,29.742) 56.245,28.499 v1@61.062,28.499 ; v1@56.058,31 56.058,32.442 55.233,33.267 55.233,34.267 53.788,35.712 v1(53.035,35.712) 53.698,36.375 53.698,36.523 53.696,36.525 53.696,37.999 54.051,38.354 v1(54.051,38.379) 54.127,38.379 54.457,38.71 55.524,38.71 v1(56.591,39.776)
  Signal w0.254: v1(45.51,29.788) v1@55.108,29.788
  Bottom Layer w0.178: R11.2@53.823,28.727 54.864,28.727 R13.2@55.626,29.489 ; R13.2@55.559,29.556 55.559,30.492 v1(56.06,30.992) ; R10.2@61.011,29.304 61.064,29.251 v1(61.064,28.561)
  Bottom Layer w0.254: v1@45.491,29.769 v1(45.51,29.788) 45.585,29.863 R9.2@46.482,29.863 ; v1(53.035,35.712) 53.104,35.712 53.161,35.655 53.778,35.655 C14.1@54.051,35.382 ; v1(55.002,29.742) 55.071,29.742 55.15,29.662 55.453,29.662 55.559,29.556 R13.2@55.626,29.489
MEZZ_EN: J1.10 R3.2 R23.2 R32.2 | length 80
  Signal w0.178: v1(26.923,35.01) 34.49,35.01 41.75,27.75 47.779,27.75 ; v1(34.252,7.492) 35.259,8.5 47.5,8.5 48,9 48,26.471 48.529,27 ; 47.75,27.721 47.779,27.75 ; v1(59.959,25.058) 59.901,25 57.5,25 55.728,26.772 51.272,26.772 50.75,26.25 49.279,26.25 48.529,27 ; 47.779,27.75 48.529,27
  Bottom Layer w0.178: v1@26.924,35.001 26.975,35.052 R32.2@26.975,35.959 R32.2@26.983,35.951 ; R23.2@34.222,3.488 R23.2@34.011,3.277 35.423,3.277 35.985,3.839 J1.10@36.207,3.839 34.25,5.795 v1@34.25,7.5 ; v1@60,25 60.046,25.046 R3.2@60.046,26.492
MEZZ_EN_SPARE: J3.3 R4.2 R24.2 R33.2 | length 114.4
  Signal w0.178: v1(22.022,35.052) 22.72,35.75 34.5,35.75 42.055,28.195 47.945,28.195 49.321,26.818 50.679,26.818 51.064,27.203 56.25,27.203 57.722,25.731 v1(57.722,25.719) ; J3.3@22.098,6.858 20.99,5.75 18.75,5.75 18.324,5.324 18.324,3.75 19.324,2.75 31.624,2.75 ; v1(30.01,4.363) 31.624,2.75 ; v1(58.613,24.271) 53.271,24.271 52.25,23.25 52.25,5 50,2.75 31.624,2.75
  Bottom Layer w0.178: v1(22.022,35.052) 22.047,35.077 R33.2@22.047,36.017 R33.2@22.088,35.976 ; v1@30.023,4.369 30.023,3.962 R24.2@30.556,3.429 ; R24.2@30.556,3.251 R24.2@30.564,3.243 ; v1(57.722,25.719) 58.544,25.719 58.598,25.773 ; v1@57.75,25.75 v1@57.773,25.773 ; v1@58.5,24.25 58.598,24.348 58.598,25.773 ; R4.2@58.623,26.459 58.598,26.434 58.598,25.773
NetC16_1: C16.1 R15.1 | length 1.6
  Bottom Layer w0.254: C16.1@47.854,29.007 48.565,29.007 R15.1@49.2,29.642
NetC17_1: C17.1 R16.1 | length 1.7
  Bottom Layer w0.254: R16.1@58.039,29.761 58.707,29.761 C17.1@59.461,29.007
NetD2_2: D2.2 J1.03 J1.04 J1.05 J1.06
  other v1: 42.672,10.16 42.672,11.176
NetD3_2: D3.2 J3.2 J3.7
NetL1_1: L1.1 R38.2 | length 3
  Top Layer w0.178: R38.2@60.63,2.405 61.46,2.405 61.709,2.654 61.709,3.162 v1(61.722,3.175)
  Bottom Layer w0.178: L1.1@60.655,3.746 60.947,3.454 61.353,3.454 61.633,3.175 v1(61.722,3.175)
NetR5_1: R5.1 R6.2 | length 1.9
  Bottom Layer w0.254: R6.2@40.894,40.64 40.957,40.703 40.957,42.405 R5.1@41.021,42.469
NetR27_1: R27.1 R28.2 | length 2.4
  Top Layer w0.178: R28.2@39.414,14.295 39.7,14.582 R28.2@39.7,14.707 39.7,16.13 39.903,16.332 R27.1@39.778,16.332
NetR36_1: R36.1 R37.2 | length 1.1
  Top Layer w0.178: R36.1@24.309,49.124 R37.2@25.451,49.124
PGOOD1: R11.1 R12.2 U1.G5 | length 10